# Altium PCB NMEA2K-Converter-v1.0.PcbDoc (part 1 of 4)
Units mil, origin at the board's own origin, x right, y up, seen from the top; angles counter-clockwise.
Board outline 1771.65 x 1968.5 mil, 4 copper layers (Top Layer, Layer 1, Layer 2, Bottom Layer), stack 62.45 mil thick; 138 components, 82 nets, 467 pads, 178 vias.
Unrouted connection lines stored in the file: 6.
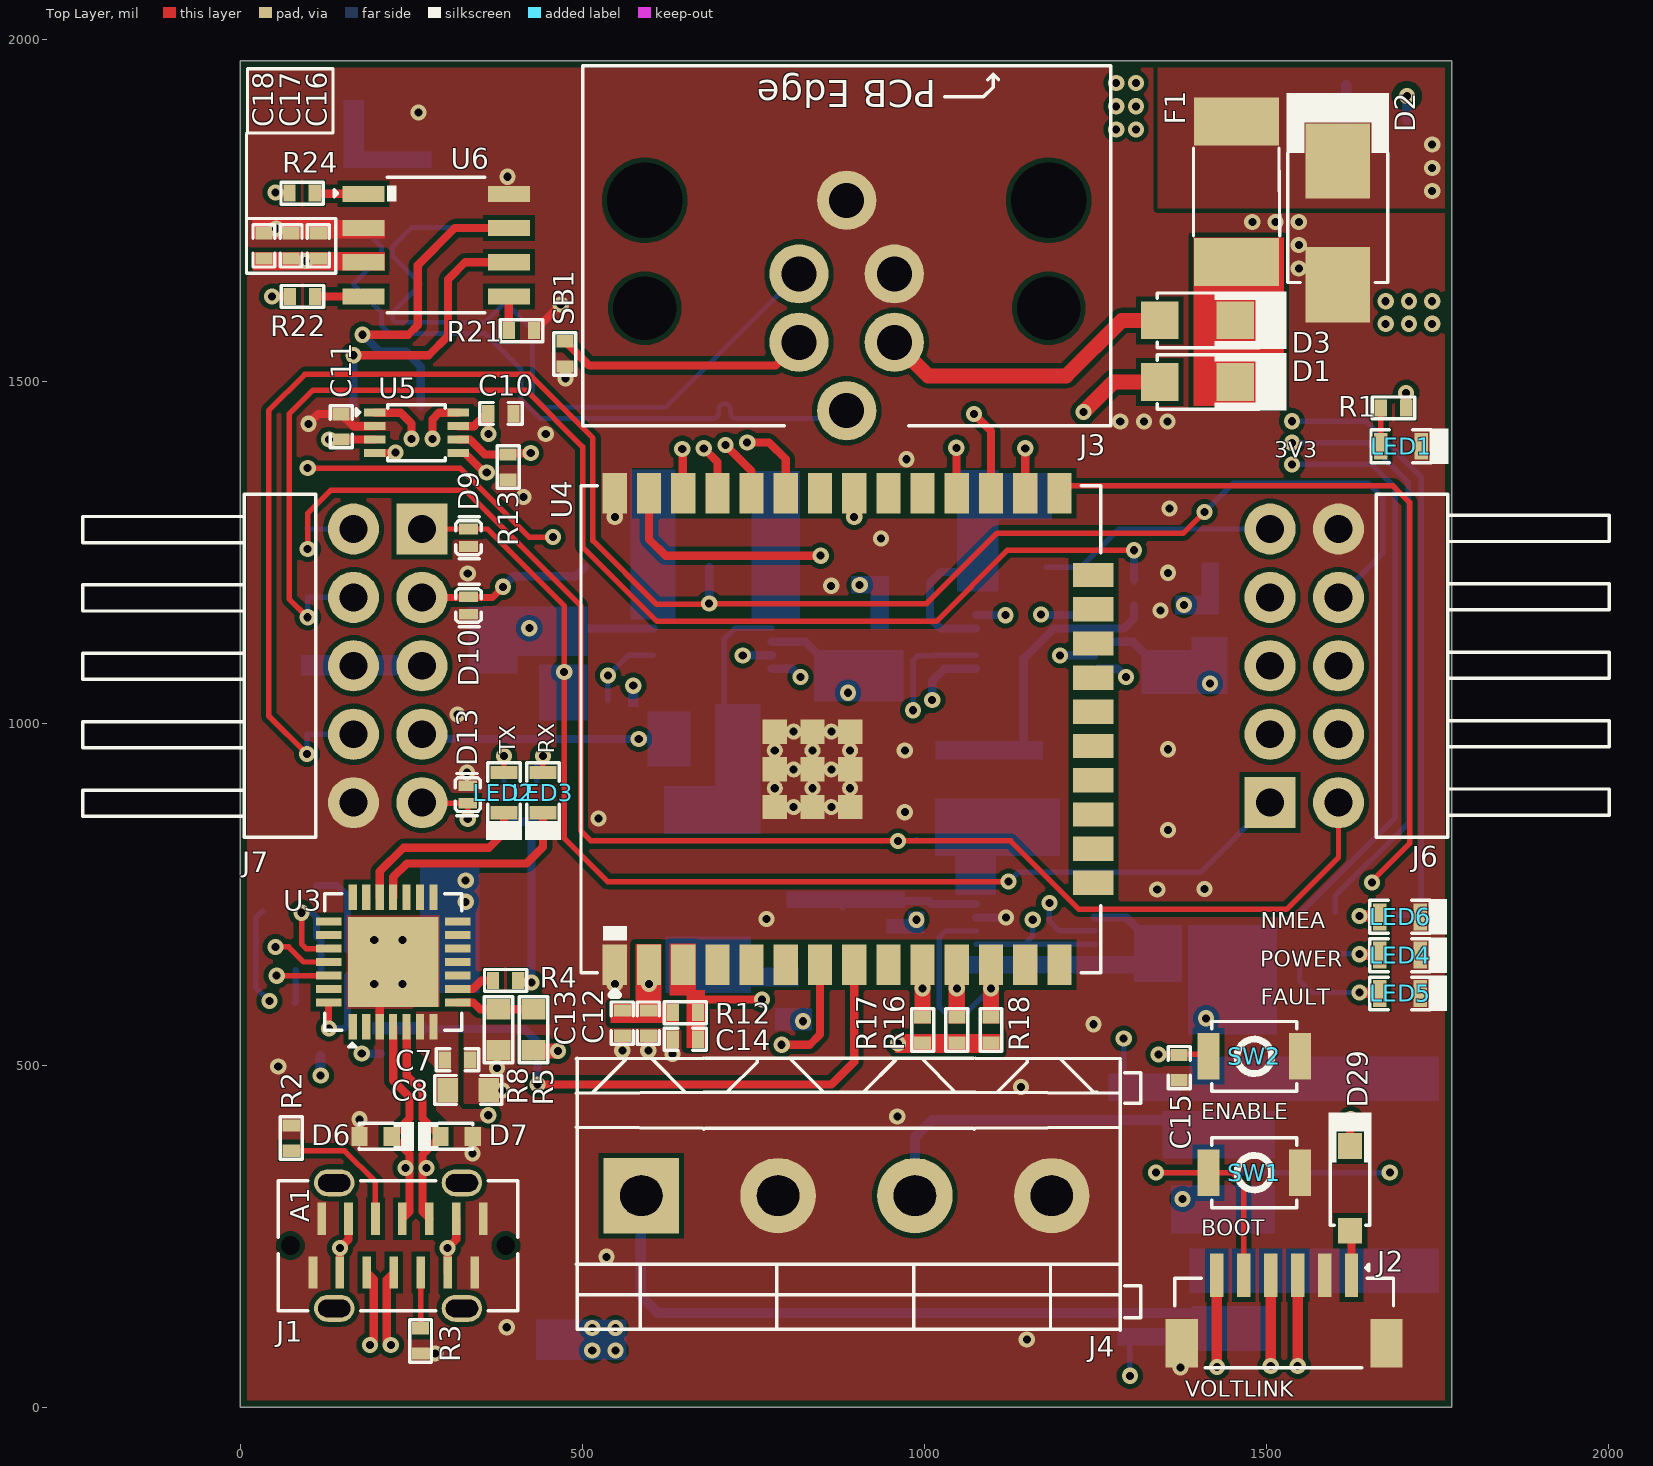
[diagram p0: Top Layer view]
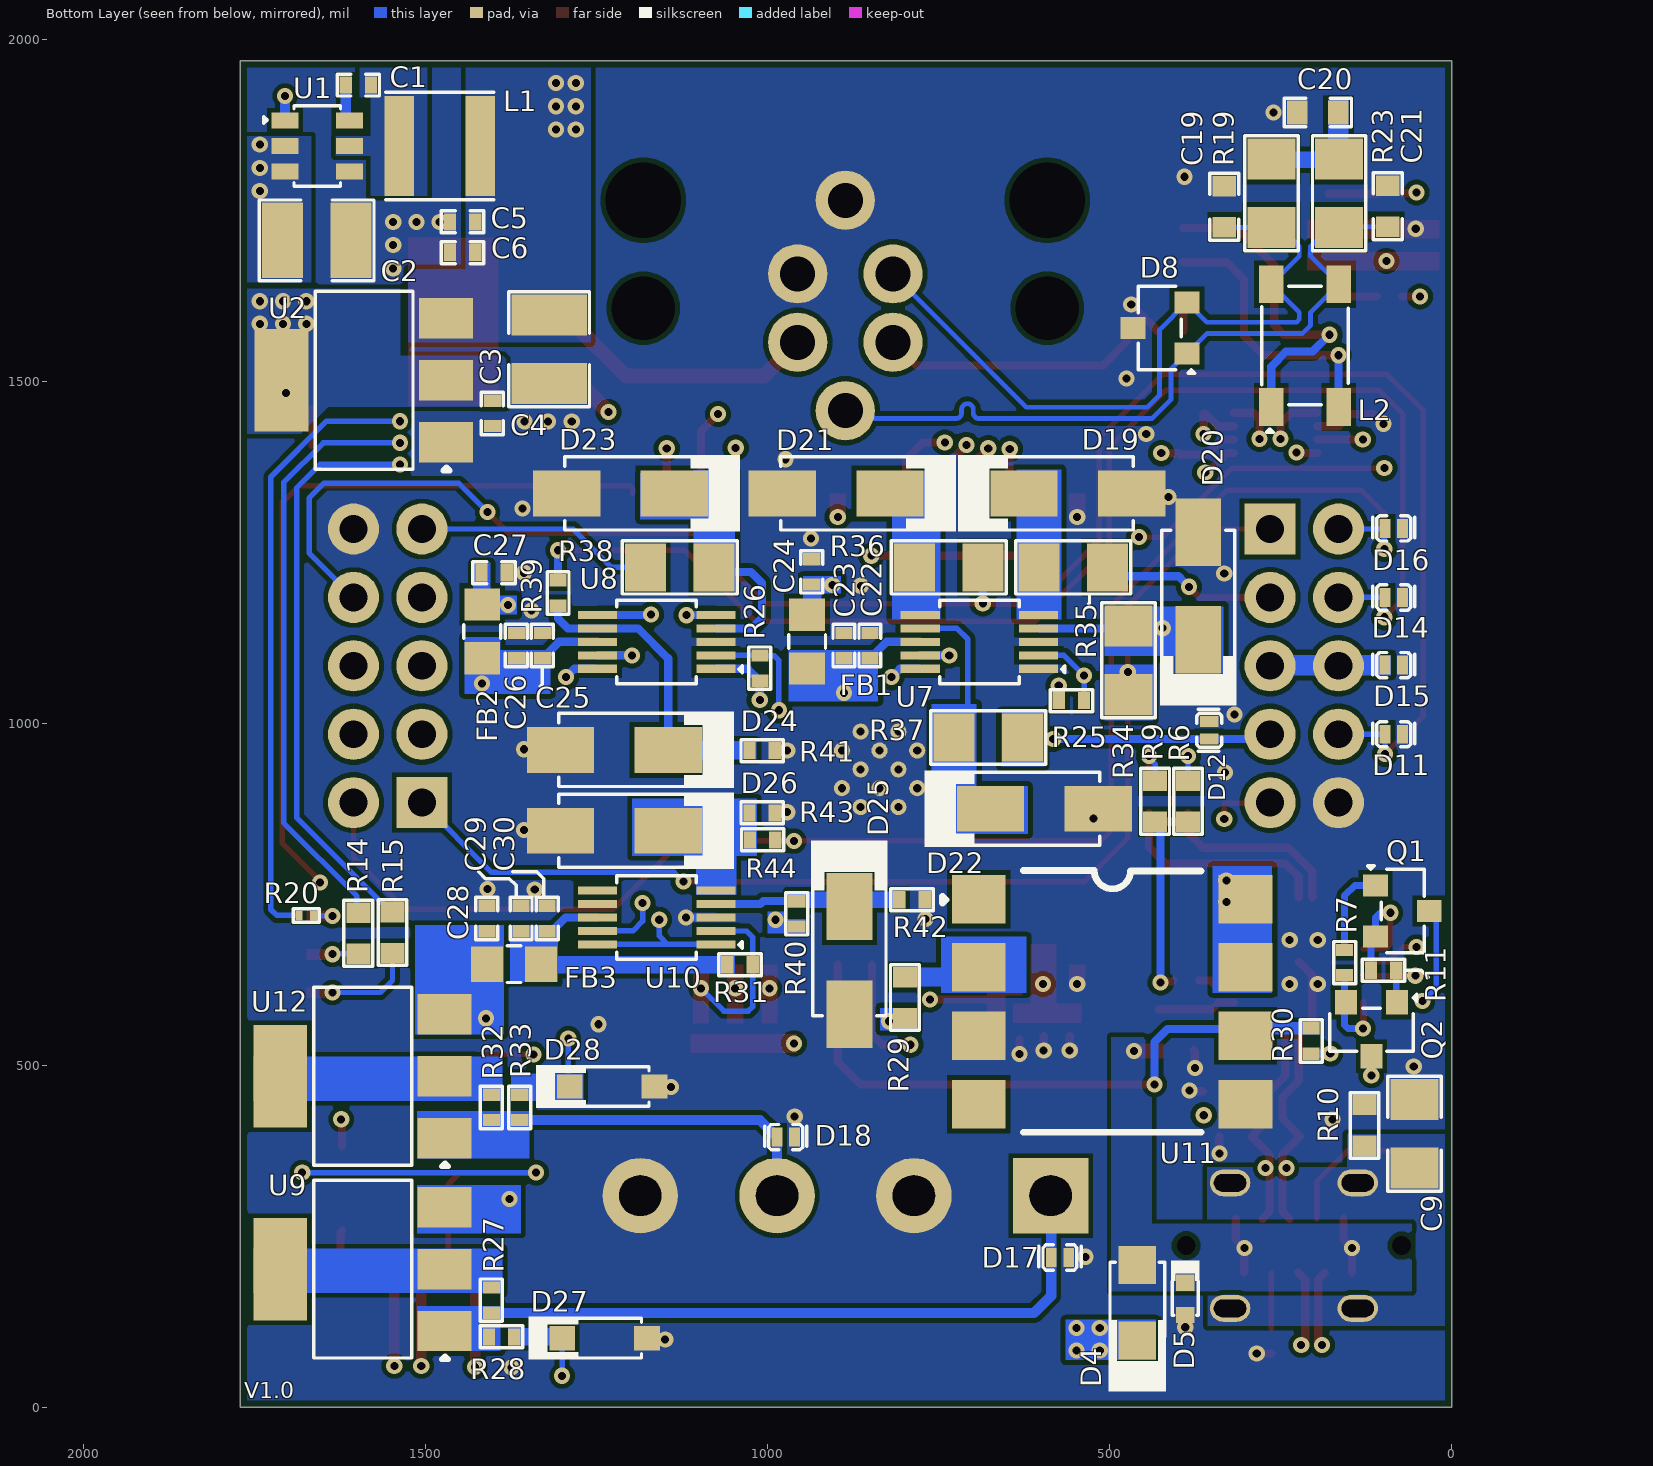
[diagram p1: Bottom Layer view, seen from below]
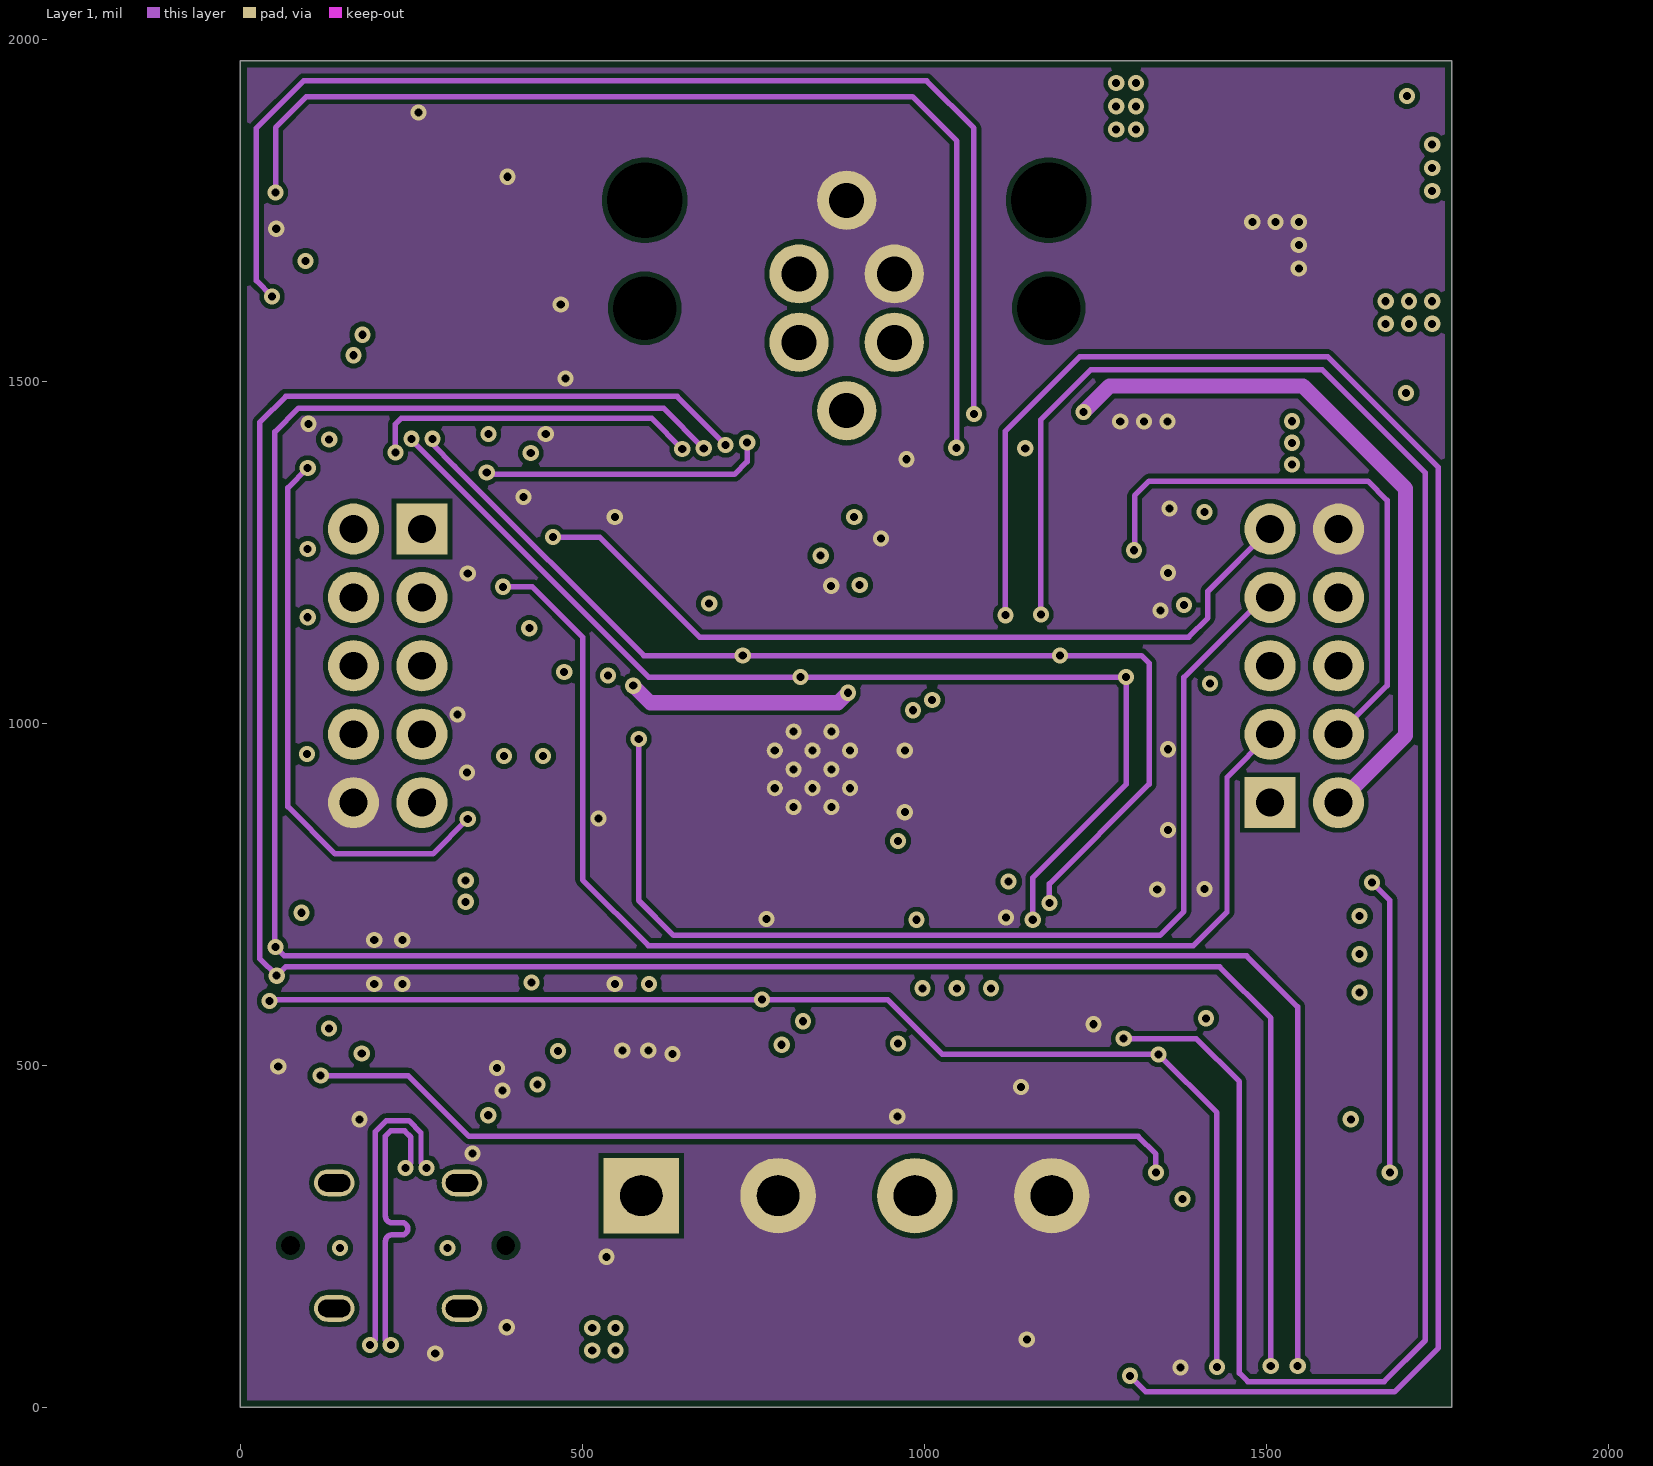
[diagram p2: Layer 1]
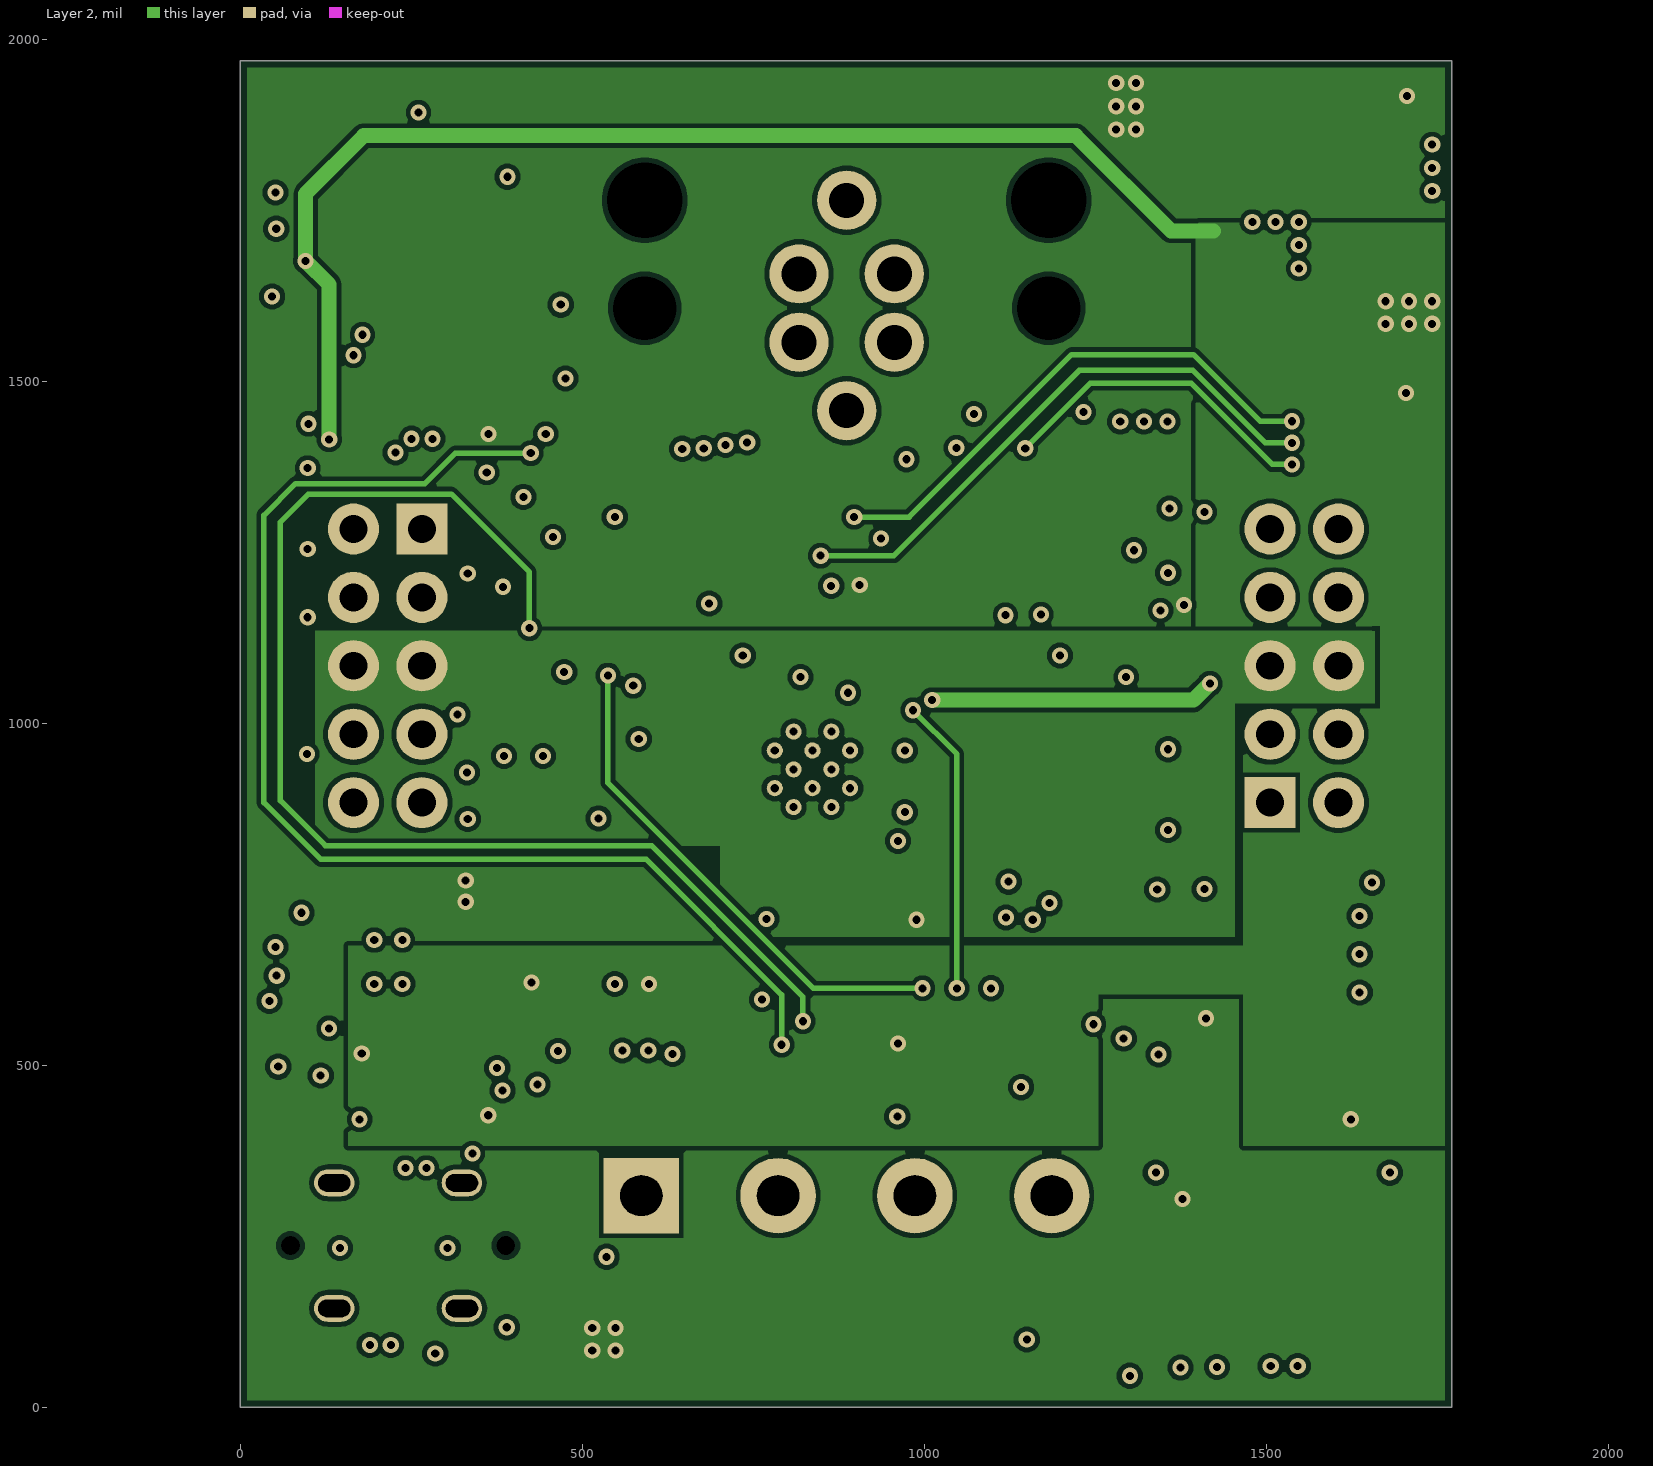
[diagram p3: Layer 2]
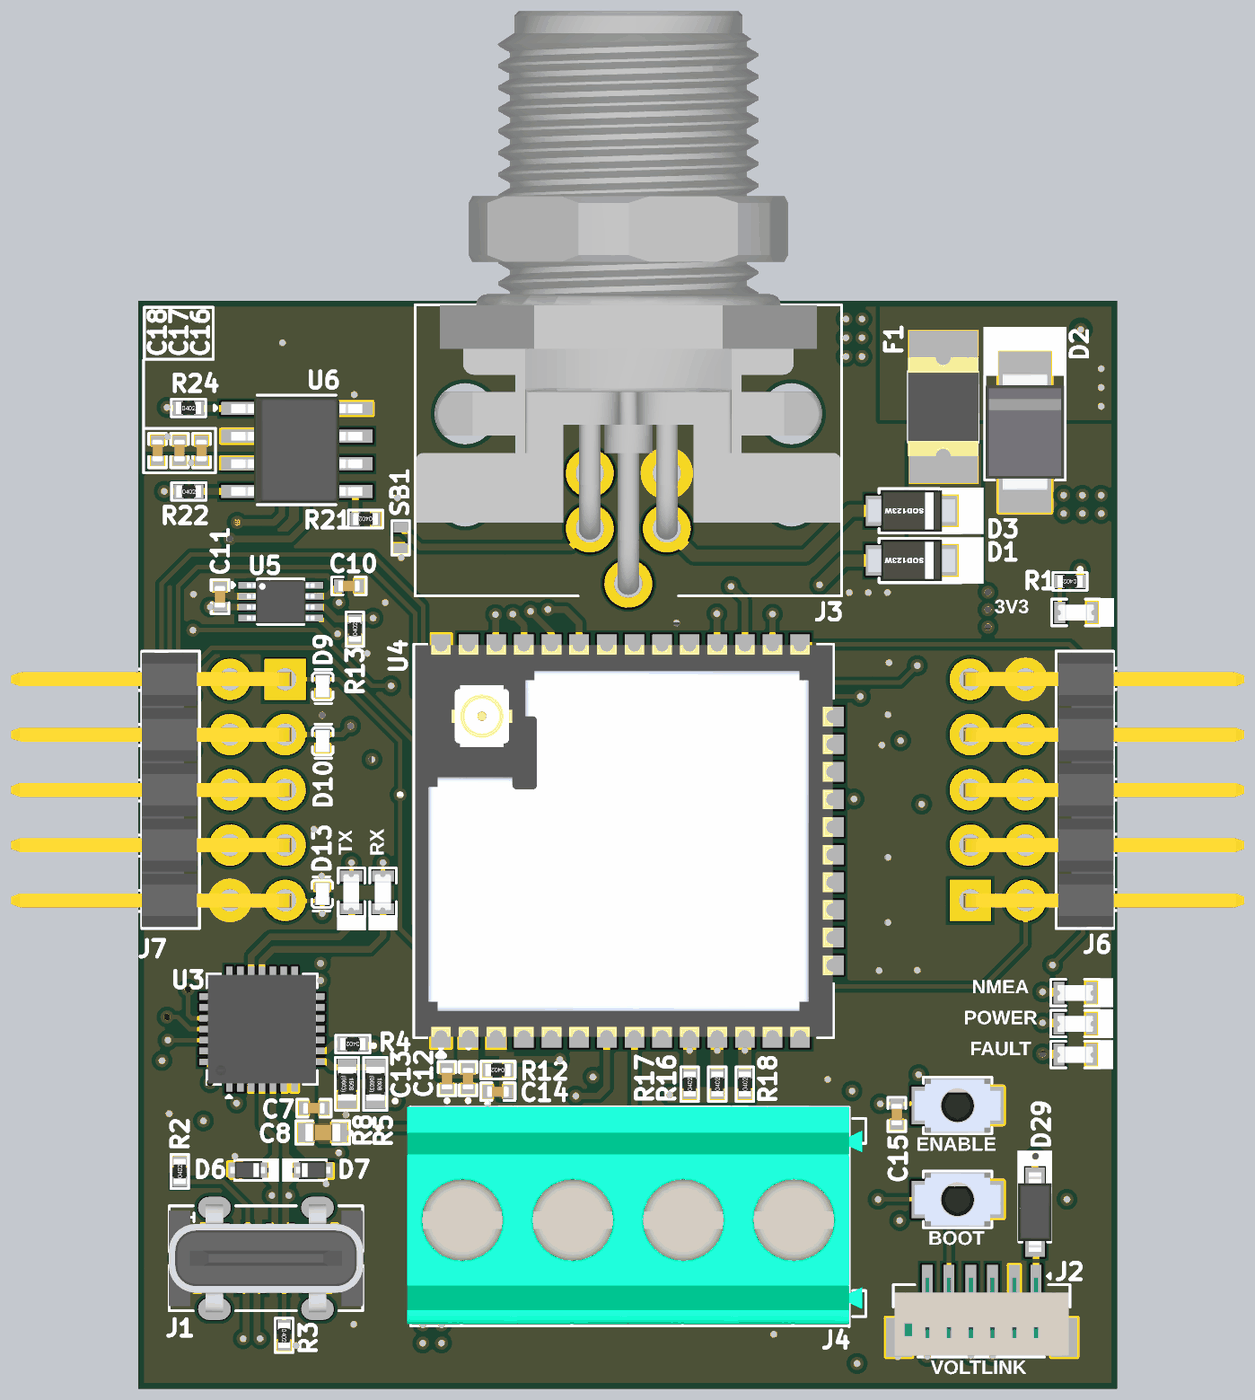
[diagram p5: 3D render of the assembled board from above, using the file's embedded part models]
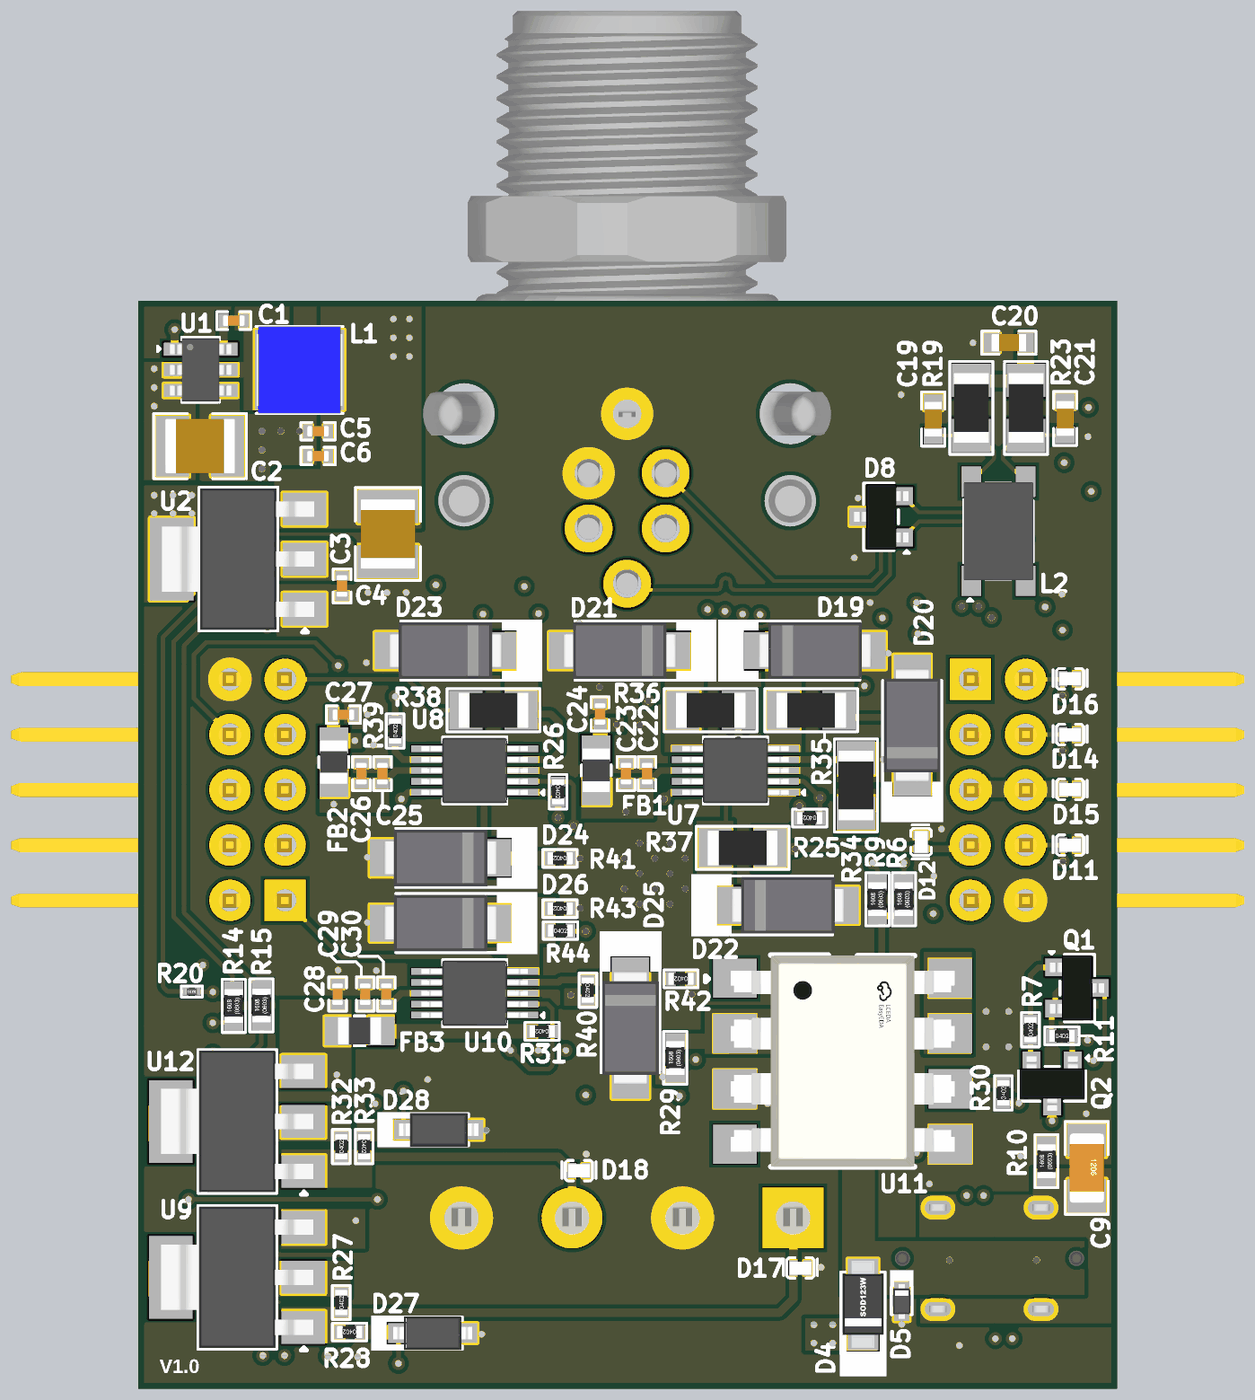
[diagram p6: 3D render of the assembled board from below, using the file's embedded part models]

## Layer stack, top to bottom
Top Solder: solder mask 0.4, Solder Resist, Dk 3.5
Top Layer: signal copper 1.38
Dielectric 2: prepreg 8.28, PP-006, Dk 4.1
Layer 1: signal copper 0.6
Dielectric 1: dielectric 41.93, FR-4, Dk 4.8
Layer 2: signal copper 0.6
Dielectric 3: prepreg 8.28, PP-006, Dk 4.1
Bottom Layer: signal copper 1.38
Bottom Solder: solder mask 0.4, Solder Resist, Dk 3.5

## Board outline
0,0 0,1968.5 1771.65,1968.5 1771.65,0

## Design rules (kind name [scope] priority, off if disabled: settings)
BoardOutlineClearance [All] p1: gap=0 ignorepadtopadclearanceinfootprint=FALSE except(10: Poly-OutlineEdge)
Clearance [All] p1: gap=7 ignorepadtopadclearanceinfootprint=FALSE except(0: Arc-Hole Track-Hole SMDPad-Hole THPad-Hole Via-Hole Fill-Hole Poly-Hole Region-Hole Text-Hole; 4: Arc-SMDPad Track-SMDPad SMDPad-SMDPad)
DiffPairsRouting USB [InDifferentialPairClass('USB_Lines')] p1: maxlimit=7 minlimit=7 mostfreqgap=7 toplayer_minwidth=12 toplayer_maxwidth=12 toplayer_prefwidth=12 midlayer1_minwidth=8 midlayer1_maxwidth=8 midlayer1_prefwidth=8 midlayer2_minwidth=8 midlayer2_maxwidth=8 midlayer2_prefwidth=8 bottomlayer_minwidth=12 bottomlayer_maxwidth=12 bottomlayer_prefwidth=12 impedanceprofiledriven=TRUE impedanceprofileid={A776B313-DDE5-488D-8E31-36333F006AAE} impedanceprofilevalue=90.000000 maxuncoupledlength=500
DiffPairsRouting CAN [InDifferentialPairClass('CAN_Lines')] p2: maxlimit=20 minlimit=9.5 mostfreqgap=20 toplayer_maxgap=9.5 toplayer_prefgap=9.5 toplayer_minwidth=7 toplayer_maxwidth=7 toplayer_prefwidth=7 midlayer1_mingap=20 midlayer1_minwidth=6 midlayer1_maxwidth=6 midlayer1_prefwidth=6 midlayer2_mingap=20 midlayer2_minwidth=6 midlayer2_maxwidth=6 midlayer2_prefwidth=6 bottomlayer_maxgap=9.5 bottomlayer_prefgap=9.5 bottomlayer_minwidth=7 bottomlayer_maxwidth=7 bottomlayer_prefwidth=7 impedanceprofiledriven=TRUE impedanceprofileid={79B5C155-D1C5-4A66-922E-B5FAAE6D1B49} impedanceprofilevalue=120.000000 maxuncoupledlength=500
HoleSize [All] p1: absolutevalues=TRUE maxlimit=1000 minlimit=1 maxpercent=80.000 minpercent=20.000
HoleToHoleClearance [All] p1: gap=2 allowstackedmicrovias=TRUE
MatchedLengths "Schematic Matched Net Lengths" [InNetClass('USB')] p1: tolerance=50 checknetsindiffpair=TRUE checkdiffpairvsdiffpair=FALSE checkxsignals=FALSE checkothers=FALSE
MaxMinImpedance "Schematic Impedance Constraint" [InNetClass('USB')] p1: minimum=85.00 maximum=90.00
MinimumSolderMaskSliver [All] p1: minsoldermaskwidth=0
PlaneConnect [All] p1: planeconnectstyle=Direct reliefexpansion=20 reliefentries=4 reliefconductorwidth=30 reliefairgap=10
PolygonConnect [All] p1: connectstyle=Direct reliefconductorwidth=10 reliefentries=4 polygonreliefangle="90 Angle" airgapwidth=10
RoutingVias [All] p1: holewidth=11.81 width=23.62 viastyle="Through Hole" minholewidth=11.81 minwidth=23.62 maxholewidth=11.81 maxwidth=23.62
SilkToSilkClearance [All] p1: silktosilkclearance=0
SilkToSolderMaskClearance [IsPad] p1: minsilkscreentomaskgap=0 clearancetoexposedcopper=TRUE
SolderMaskExpansion [All] p1: expansion=4 istentingtop=FALSE
UnRoutedNet [All] p1: checkbadconnections=TRUE
Width [All] p1: maxlimit=100 minlimit=6 preferedwidth=12
22 further rules are at their usual default settings.

## Classes and differential pairs
differential pair class USB_Lines: USB_D
differential pair class CAN_Lines: CAN
net class USB: USB_D_N USB_D_P
net class CAN: CAN_N CAN_P
component class U_USB-to-UART-Sheet: C7 C8 C9 D4 D5 D6 D7 J1 LED2 LED3 Q1 Q2 R2 R3 R4 R5 R6 R7 R8 R9 R10 R11 U3
component class U_Sensor-Interface-Sheet: C22 C23 C24 C25 C26 C27 C28 C29 C30 D9 D10 D11 D12 D13 D14 D15 D16 D17 D18 D19 D20 D21 D22 D23 D24 D25 D26 D27 D28 FB1 FB2 FB3 J4 J6 J7 R25 R26 R27 R28 R29 R30 R31 R32 R33 R34 R35 R36 R37 R38 R39 R40 R41 R42 R43 R44 U7 U8 U9 U10 U11 U12
component class U_Power-Sheet-2: C1 C2 C3 C4 C5 C6 D1 D2 D3 F1 L1 LED1 R1 U1 U2
component class U_Controller-Sheet: C10 C11 C12 C13 C14 C15 D29 J2 LED4 LED5 R12 R13 R14 R15 R16 R17 R18 SW1 SW2 U4 U5
component class U_CAN-Transceiver-Sheet: C16 C17 C18 C19 C20 C21 D8 J3 L2 LED6 R19 R20 R21 R22 R23 R24 SB1 U6
differential pair USB_D: +USB_D_P -USB_D_N
differential pair CAN: +CAN_P -CAN_N

## Components (designator, comment, footprint, x,y, rotation, side; value= is the part's Value field where it differs from the comment)
C1 "0.1uF" Cap-0402 1598.87,1932.68 r0 bottom
C2 "10uF" Cap-1210 1659.87,1705.68 r0 bottom
C3 "22uF" Cap-0402 1402.87,1452.68 r90 bottom
C4 "10uF" Cap-1210 1319.87,1546.68 r90 bottom
C5 "22uF" Cap-0402 1446.37,1732.68 r180 bottom
C6 "22uF" Cap-0402 1446.37,1687.68 r180 bottom
C7 "1uF" Cap-0402 317.87,507.68 r0 top
C8 "4.7UF" Cap-0603 333.87,463.68 r180 top
C9 "4.7nF" Cap-1206 54.87,399.68 r270 bottom
C10 "0.1uF" Cap-0402 381.37,1452.68 r180 top
C11 "0.1uF" Cap-0402 147.87,1433.18 r270 top
C12 "22uF" Cap-0402 596.87,561.18 r90 top
C13 "0.1uF" Cap-0402 558.87,561.18 r90 top
C14 "0.1uF" Cap-0402 650.87,537.68 r0 top
C15 "0.1uF" Cap-0402 1372.87,496.18 r90 top
C16 "0.1uF" Cap-0402 114.37,1697.68 r270 top
C17 "1uF" Cap-0402 74.62,1697.68 r90 top
C18 "10uF" Cap-0402 34.87,1697.68 r270 top
C19 "68pF" Cap-0603 332.87,1754.68 r270 bottom
C20 "4.7nF" Cap-0603 195.87,1892.68 r0 bottom
C21 "68pF" Cap-0603 93.87,1755.68 r90 bottom
C22 "0.1uF" Cap-0402 850.87,1113.18 r90 bottom
C23 "1uF" Cap-0402 888.87,1113.18 r90 bottom
C24 "1uF" Cap-0402 935.87,1221.18 r90 bottom
C25 "0.1uF" Cap-0402 1329.75,1113.18 r90 bottom
C26 "1uF" Cap-0402 1367.87,1113.18 r90 bottom
C27 "1uF" Cap-0402 1400.37,1219.68 r180 bottom
C28 "0.1uF" Cap-0402 1322.75,714.18 r90 bottom
C29 "1uF" Cap-0402 1360.87,714.18 r90 bottom
C30 "1uF" Cap-0402 1410.87,714.18 r90 bottom
D1 "PMEG3010ER,115" SOD-123W 1399.76,1498.68 r0 top
D2 "SMBJ26A-13-F" SMB_ 1604.87,1731.13 r90 top
D3 "PMEG3010ER,115" SOD-123W 1399.76,1588.68 r0 top
D4 "PMEG3010ER,115" SOD-123W 459.87,152.56 r270 bottom
D5 "LESD5D5.0CT1G" SOD-523 389.87,158.06 r90 bottom
D6 "LESD5D5.0CT1G" SOD-523 198.25,395.68 r0 top
D7 "LESD5D5.0CT1G" SOD-523 316.5,395.68 r180 top
D8 "CDSOT23-SM712" SOT-23 426.87,1577.68 r90 bottom value=75pF
D9 "PESD12VV1BL,315" "DFN1006-2L (Bi-Directional)" 333.87,1270.88 r90 top value=25pF
D10 "PESD12VV1BL,315" "DFN1006-2L (Bi-Directional)" 333.87,1171.88 r90 top value=25pF
D11 "PESD12VV1BL,315" "DFN1006-2L (Bi-Directional)" 85.08,983.68 r0 bottom value=25pF
D12 "PESD12VV1BL,315" "DFN1006-2L (Bi-Directional)" 354.87,989.47 r270 bottom value=25pF
D13 "PESD12VV1BL,315" "DFN1006-2L (Bi-Directional)" 332.87,895.47 r270 top value=25pF
D14 "PESD12VV1BL,315" "DFN1006-2L (Bi-Directional)" 85.08,1183.68 r0 bottom value=25pF
D15 "PESD12VV1BL,315" "DFN1006-2L (Bi-Directional)" 85.08,1084.68 r0 bottom value=25pF
D16 "PESD12VV1BL,315" "DFN1006-2L (Bi-Directional)" 85.08,1284.68 r0 bottom value=25pF
D17 "PESD12VV1BL,315" "DFN1006-2L (Bi-Directional)" 573.08,218.68 r0 bottom value=25pF
D18 "PESD12VV1BL,315" "DFN1006-2L (Bi-Directional)" 974.08,394.68 r0 bottom value=25pF
D19 "1SMA4733A" SMA 370.87,1200.42 r90 bottom
D20 "1SMA4733A" SMA 546.87,1335.68 r180 bottom
D21 "1SMA4733A" SMA 900.27,1335.68 r0 bottom
D22 "1SMA4733A" SMA 595.87,874.68 r180 bottom
D23 "1SMA4733A" SMA 1215.61,1335.68 r0 bottom
D24 "1SMA4733A" SMA 1224.61,960.68 r0 bottom
D25 "1SMA4733A" SMA 880.87,652.94 r270 bottom
D26 "1SMA4733A" SMA 1224.61,842.68 r0 bottom
D27 "MMSZ5231B-7-F" SOD-123 1238.87,100.68 r0 bottom
D28 "MMSZ5231B-7-F" SOD-123 1227.87,468.68 r0 bottom
D29 "MBR120VLSFT3G" SOD-123 1622.87,319.68 r90 top
F1 "1812L075/48GR" 1812-FUSE 1456.87,1776.68 r270 top
FB1 "MMZ2012R102ATD25" Ind-0805 942.87,1119.05 r90 bottom
FB2 "MMZ2012R102ATD25" Ind-0805 1417.87,1134.05 r90 bottom
FB3 "MMZ2012R102ATD25" Ind-0805 1371.24,647.68 r0 bottom
J1 "TYPE-C-31-D-07" TYPE-C-31-D-07 231.06,236.05 r90 top
J2 "Voltlink Target" "Voltlink Target" 1526.45,142.97 r180 top
J3 "T4144035051-000" T4144035051-000 886.87,1610.42 r180 top locked
J4 "DB128L-5.08-4P-GN-S" DB128L-5.08-4P-GN-S 886.61,309.06 r0 top
J6 "2541WR-2x05P" "HDR 2x5TH (rigth angle)" 1555.87,1083.68 r90 top
J7 "2541WR-2x05P" "HDR 2x5TH (rigth angle)" 215.87,1083.68 r270 top
L1 "4.7uH" SWPA4030S4R7MT_ 1479.82,1843.68 r180 bottom
L2 "ACT45B-510-2P-TL003" ACT45B-510-2P-TL003 214.87,1551.68 r90 bottom value=51uH
LED1 "RED" LED-0603 1697.35,1404.68 r0 top
LED2 "Yellow" LED-0603 385.87,898.2 r270 top
LED3 "Yellow" LED-0603 442.87,898.2 r270 top
LED4 "Emerald" LED-0603 1695.82,660.68 r0 top
LED5 "RED" LED-0603 1695.82,604.68 r0 top
LED6 "Blue" LED-0603 1695.82,716.68 r0 top
Q1 "SS8050-G" SOT-23 72.5,725.08 r270 bottom
Q2 "SS8050-G" SOT-23 117.47,552.31 r0 bottom
R1 "240R" Res-0402 1686.32,1460.73 r180 top
R2 "5.1K" Res-0402 74.87,393.18 r90 top
R3 "5.1K" Res-0402 263.87,96.68 r270 top
R4 "2K" Res-0402 388.37,623.68 r180 top value=2kR
R5 "22.1K" Res-0603 428.87,551.68 r90 top
R6 "220R" Res-0603 385.87,885.68 r270 bottom
R7 "10K" Res-0402 156.87,649.68 r90 bottom
R8 "47.5K" Res-0603 377.87,551.68 r90 top
R9 "220R" Res-0603 433.87,885.68 r270 bottom
R10 "1M" Res-0603 127.87,411.68 r270 bottom
R11 "10K" Res-0402 99.87,638.68 r180 bottom
R12 "10K" Res-0402 650.87,576.68 r180 top
R13 "4.7K" Res-0402 391.87,1374.18 r90 top
R14 "240R" Res-0603 1598.87,692.68 r270 bottom
R15 "240R" Res-0603 1548.87,693.68 r270 bottom
R16 "4.7K" Res-0402 997.87,551.18 r90 top
R17 "4.7K" Res-0402 1047.87,551.18 r90 top
R18 "4.7K" Res-0402 1097.87,551.18 r90 top
R19 "59R" Res-1206 263.87,1774.68 r270 bottom
R20 "220R" Res-0201 1674.7,718.68 r0 bottom
R21 "3.3K" Res-0402 411.37,1573.68 r180 top
R22 "0R" Res-0402 91.37,1623.68 r0 top
R23 "59R" Res-1206 164.87,1774.68 r90 bottom
R24 "0R" Res-0402 90.87,1774.68 r0 top
R25 "10K" Res-0402 556.37,1032.68 r0 bottom
R26 "10K" Res-0402 1011.87,1080.18 r270 bottom
R27 "120R" Res-0402 1404.37,156.18 r90 bottom
R28 "100R" Res-0402 1389.37,102.68 r0 bottom
R29 "470R" Res-0603 799.87,598.68 r270 bottom
R30 "3.3K" Res-0402 205.87,535.18 r90 bottom
R31 "10K" Res-0402 1040.87,646.68 r0 bottom
R32 "120R" Res-0402 1404.37,438.18 r90 bottom
R33 "100R" Res-0402 1362.87,438.18 r270 bottom
R34 "100R" Res-1206 472.87,1091.68 r270 bottom
R35 "100R" Res-1206 553.87,1227.68 r180 bottom
R36 "100R" Res-1206 735.87,1227.68 r180 bottom
R37 "100R" Res-1206 677.87,978.68 r180 bottom
R38 "100R" Res-1206 1128.87,1227.68 r0 bottom
R39 "100K" Res-0402 1306.87,1190.18 r90 bottom
R40 "100K" Res-0402 957.87,721.18 r270 bottom
R41 "39K" Res-0402 1008.37,959.68 r0 bottom
R42 "39K" Res-0402 789.37,741.68 r0 bottom
R43 "39K" Res-0402 1008.37,868.68 r0 bottom
R44 "100K" Res-0402 1007.67,829.2 r180 bottom
SB1 "Solder Bridge 0402" "Solder Bridge 0402" 474.87,1539.68 r90 top
SW1 "B3U-1000P" B3U-1000P 1482.87,342.68 r0 top
SW2 "B3U-1000P" B3U-1000P 1482.87,512.68 r0 top
U1 "AP63205WU-7" TSOT-23-6 1658.87,1843.68 r180 bottom
U2 "AMS1117-3.3" "SOT- 223" 1590.95,1501.13 r90 bottom
U3 "CP2102N-A02-GQFN28R" "28-QFN (5x5)_" 223.87,650.68 r90 top
U4 "ESP32-WROOM-32UE-N16" ESP32-WROOM-32UE-N16 897.48,991.19 r90 top
U5 "TXS0102DCUR" VSSOP-8(3.1x2.1) 257.85,1424.2 r0 top
U6 "TCAN3414DR" "SOIC-8(0.154\", 3.90mm Width)" 286.87,1698.68 r0 top
U7 "ADS1115IDGSR" VSSOP-10 690.73,1118.71 r0 bottom
U8 "ADS1115IDGSR" VSSOP-10 1162.73,1118.71 r0 bottom
U9 "LM317MDCYR" "SOT- 223" 1592.94,201.68 r90 bottom
U10 "ADS1115IDGSR" VSSOP-10 1162.73,715.68 r0 bottom
U11 "6N137S" "SOP-8 (S Type)" 496.87,592.68 r180 bottom
U12 "LM317MDCYR" "SOT- 223" 1592.94,483.68 r90 bottom

## Footprints (in the part's own frame and the unit in brackets; to place one, negate y for a bottom-side part, rotate by r counter-clockwise, add the part's x,y. Pads: shape width x height; smd on the part's side, far side on the other; paste and mask are expansions set on the pad)
"28-QFN (5x5)_" [mm]
  rect 0.95x0.3 smd: 1(-2.4,1.5) 2(-2.4,1) 3(-2.4,0.5) 4(-2.4,0) 5(-2.4,-0.5) 6(-2.4,-1) 7(-2.4,-1.5) 15(2.4,-1.5) 16(2.4,-1) 17(2.4,-0.5) 18(2.4,0) 19(2.4,0.5) 20(2.4,1) 21(2.4,1.5)
  rect 0.3x0.95 smd: 8(-1.5,-2.4) 9(-1,-2.4) 10(-0.5,-2.4) 11(0,-2.4) 12(0.5,-2.4) 13(1,-2.4) 14(1.5,-2.4) 22(1.5,2.4) 23(1,2.4) 24(0.5,2.4) 25(0,2.4) 26(-0.5,2.4) 27(-1,2.4) 28(-1.5,2.4)
  rect 3.35x3.35 smd: 29(0,0)
  silkscreen extent -3.15,-2.54 2.54,2.54, body extent -2.5,-2.5 2.5,2.5, height 1
1812-FUSE [mm] "13.2V 2.6A 40A 800mW -40?~+85? 5.2A 10mO 2.5s 50mO 1812 Resettable Fuses ROHS"
  rect 1.78x3.15 smd mask+0.05: 1(-2.615,0) 2(2.615,0)
  silkscreen extent -1.63,-1.6 1.63,1.6, body extent -2.27,-1.62 2.27,1.62, height 0.85
ACT45B-510-2P-TL003 [mm]
  rect 1.4x0.9 smd paste+0 mask+0.051: 1(-2.28,1.25) 2(-2.28,-1.25) 3(2.28,-1.25) 4(2.28,1.25)
  silkscreen extent -3.22,-1.6 2.2,1.6, body extent -2.25,-1.6 2.25,1.6, height 3
B3U-1000P [mm] "SWITCH TACTILE SPST-NO 0.05A 12V"
  rect 0.82x1.72 smd: 1(-1.7,0) 2(1.7,0)
  silkscreen extent -1.57,-1.3 1.57,1.3, body extent -2,-1.26 2,1.24, height 1.6
Cap-0402 [mil]
  rect 18x25 smd mask+2.36: 1(-18.5,0) 2(18.5,0)
  silkscreen extent -31,-16 31,16, body extent -20,-10 20,10, height 19
Cap-0603 [mil]
  rect 30x35 smd mask+2.36: 1(-30,0) 2(30,0)
  silkscreen extent -49,-21 49,21, body extent -32,-16 31,16, height 34
Cap-1206 [mil] "SMD 1206"
  rect 60x70 smd: 1(-50,0) 2(50,0)
  silkscreen extent -84,-39 84,39, body extent -63,-31 63,32, height 39
Cap-1210 [mil] "SMD 1210"
  rect 60x110 smd: 1(-50,0) 2(50,0)
  silkscreen extent -84,-59 84,59, body extent -63,-49 63,49, height 39
DB128L-5.08-4P-GN-S [mm]
  rect 2.8x2.8 hole 1.5 slot 1.575 at 0 deg paste+0 mask+0.05: 1(-7.62,0)
  round 2.8 hole 1.5 slot 1.575 at 0 deg paste+0 mask+0.05: 2(-2.54,0) 3(2.54,0) 4(7.62,0)
  silkscreen extent -10.03,-5 10.92,5.1, body extent -10.16,-4.88 10.76,5.12, height 14
"DFN1006-2L (Bi-Directional)" [mm]
  rect 0.4x0.7 smd paste+0 mask+0.051: 1(-0.325,0) 2(0.325,0)
  silkscreen extent -0.78,-0.47 0.78,0.47, body extent -0.5,-0.3 0.5,0.3, height 0.47
ESP32-WROOM-32UE-N16 [mm]
  rect 1.5x0.9 smd: 1(-8.75,8.88) 2(-8.75,7.61) 3(-8.75,6.34) 4(-8.75,5.07) 5(-8.75,3.8) 6(-8.75,2.53) 7(-8.75,1.26) 8(-8.75,-0.01) 9(-8.75,-1.28) 10(-8.75,-2.55) 11(-8.75,-3.82) 12(-8.75,-5.09) 13(-8.75,-6.36) 14(-8.75,-7.63) 25(8.75,-7.63) 26(8.75,-6.36) 27(8.75,-5.09) 28(8.75,-3.82) 29(8.75,-2.55) 30(8.75,-1.28) 31(8.75,-0.01) 32(8.75,1.26) 33(8.75,2.53) 34(8.75,3.8) 35(8.75,5.07) 36(8.75,6.34) 37(8.75,7.61) 38(8.75,8.88)
  rect 0.9x1.5 smd: 15(-5.71,-8.88) 16(-4.44,-8.88) 17(-3.17,-8.88) 18(-1.9,-8.88) 19(-0.63,-8.88) 20(0.64,-8.88) 21(1.91,-8.88) 22(3.18,-8.88) 23(4.45,-8.88) 24(5.72,-8.88)
  rect 0.9x0.9 smd: 39(-2.896,0.14) 39(-2.896,1.54) 39(-2.896,2.94) 39(-1.496,1.54) 39(-1.496,2.94) 39(-1.496,0.14) 39(-0.096,2.94) 39(-0.096,1.54) 39(-0.096,0.14)
  round 0.6 hole 0.3 mask+0: 39(-2.896,0.84) 39(-2.896,2.24) 39(-2.196,0.14) 39(-2.196,1.54) 39(-2.196,2.94) 39(-1.496,2.24) 39(-1.496,0.84) 39(-0.796,2.94) 39(-0.796,1.54) 39(-0.796,0.14) 39(-0.096,2.24) 39(-0.096,0.84)
  silkscreen extent -9.87,-9.17 9.04,10.13, body extent -9,-9.13 9,10.07, height 3.35
"HDR 2x5TH (rigth angle)" [mm]
  rect 1.9x1.9 hole 1.03 paste+0 mask+0.051: 1(-5.08,1.27)
  round 1.9 hole 1.03 paste+0 mask+0.051: 2(-5.08,-1.27) 3(-2.54,1.27) 4(-2.54,-1.27) 5(0,1.27) 6(0,-1.27) 7(2.54,1.27) 8(2.54,-1.27) 9(5.08,1.27) 10(5.08,-1.27)
  silkscreen extent -6.37,-11.33 6.37,-2.67, body extent -6.31,-11.33 6.3,1.57, height 5
Ind-0805 [mm] "Inductor 0805"
  rect 1.2x1.32 smd: 1(-1,0) 2(1,0)
  silkscreen extent -0.25,-0.69 0.25,0.69, body extent -1,-0.62 1,0.63, height 0.47
LED-0603 [mm]
  rect 0.5x1 smd: 1(-0.75,0) 2(0.75,0)
  silkscreen extent -1.12,-0.66 1.75,0.66, body extent -0.82,-0.37 0.82,0.36, height 0.68
Res-0201 [mm]
  rect 0.27x0.37 smd mask+0.055: 1(-0.275,0) 2(0.275,0)
  silkscreen extent -0.48,-0.25 0.48,0.25, body extent -0.3,-0.15 0.3,0.15, height 0.29
Res-0402 [mil]
  rect 18x25 smd mask+2.17: 1(-18.5,0) 2(18.5,0)
  silkscreen extent -32,-17 32,16, body extent -23,-11 23,11, height 16
Res-0603 [mil]
  rect 30x35 smd: 1(-30,0) 2(30,0)
  silkscreen extent -48,-21 48,21, body extent -31,-17 31,17, height 18
Res-1206 [mil]
  rect 60x70 smd: 1(-50,0) 2(50,0)
  silkscreen extent -84,-39 84,39, body extent -63,-31 63,31, height 24
SMA [mm]
  rect 2.5x1.7 smd: 1(-2,0) 2(2,0)
  silkscreen extent -4.44,-1.42 2.06,1.42, body extent -2.6,-1.3 2.6,1.3, height 2.4
SMB_ [mm]
  rect 2.8x2.4 smd: 1(-2.3,0) 2(2.3,0)
  silkscreen extent -2.21,-1.91 4.83,1.91, body extent -2.7,-1.8 2.7,1.8, height 2.3
SOD-123 [mm]
  rect 0.95x0.9 smd: 1(-1.575,0) 2(1.575,0)
  silkscreen extent -1.37,-0.8 2.82,0.8, body extent -1.82,-0.77 1.83,0.78, height 1.5
SOD-123W [mm] "DIODE SCHOTTKY 30V 1A SOD123W"
  rect 1.4x1.4 smd: 1(-1.4,0) 2(1.4,0)
  silkscreen extent -1.5,-1.07 3.3,1.07, body extent -2,-0.95 2,0.95, height 1.1
SOD-523 [mm] "SOD-523 Schottky Barrier Diodes (SBD) ROHS"
  rect 0.6x0.7 smd: 1(-0.6,0) 2(0.6,0)
  silkscreen extent -0.61,-0.53 1.42,0.53, body extent -0.8,-0.4 0.8,0.4, height 0.7
"SOIC-8(0.154\", 3.90mm Width)" [mm]
  rect 1.55x0.6 smd: 1(-2.7,1.905) 2(-2.7,0.635) 3(-2.7,-0.635) 4(-2.7,-1.905) 5(2.7,-1.905) 6(2.7,-0.635) 7(2.7,0.635) 8(2.7,1.905)
  silkscreen extent -3.79,-2.51 1.8,2.51, body extent -3.01,-2.45 3.01,2.45, height 1.63
"Solder Bridge 0402" [mil]
  rect 18x25 smd mask+2.17: 1(-18.5,0) 2(18.5,0)
  silkscreen extent -32,-17 32,16
"SOP-8 (S Type)" [mm]
  rect 2x1.8 smd paste+0 mask+0.051: 1(-4.95,3.81) 2(-4.95,1.27) 3(-4.95,-1.27) 4(-4.95,-3.81) 5(4.95,-3.81) 6(4.95,-1.27) 7(4.95,1.27) 8(4.95,3.81)
  silkscreen extent -6.3,-4.85 3.3,4.88, body extent -5.15,-4.85 5.15,4.85, height 5.08
SOT-23 [mm] "TRANS NPN 40V 0.6A SOT23"
  rect 0.82x0.92 smd: 1(-0.95,-1) 2(0.95,-1) 3(0,1)
  silkscreen extent -1.68,-1.3 1.55,0.81, body extent -1.5,-1.25 1.5,1.25, height 1.05
"SOT- 223" [mm]
  rect 1.5x2 smd: 1(-2.3,-3.05) 2(0,-3.05) 3(2.3,-3.05)
  rect 3.8x2 smd: 4(0,3.05)
  silkscreen extent -3.35,-3.2 3.3,1.8, body extent -3.25,-3.5 3.25,3.5, height 1.61
SWPA4030S4R7MT_ [mm]
  rect 1.1x3.7 smd: 1(-1.5,0) 2(1.5,0)
  silkscreen extent -2,-2 2,2, body extent -2,-2 2,2, height 3
T4144035051-000 [mm]
  round 2.2 hole 1.3: 1(1.77,1.365) 2(-1.77,1.365) 3(-1.77,-1.175) 4(1.77,-1.175) 5(0,3.905) SH(0,-3.905)
  round 0 hole 2.81 unplated: MH(-7.5,-3.905) MH(7.5,-3.905)
  round 0 hole 2.36 unplated: MH(-7.5,0.095) MH(7.5,0.095)
  silkscreen extent -9.8,-8.9 9.8,4.47, body extent -9.75,-22.4 9.75,4.41, height 16.5
TSOT-23-6 [mm]
  rect 1x0.6 smd: 1(-1.2,0.95) 2(-1.2,0) 3(-1.2,-0.95) 4(1.2,-0.95) 5(1.2,0) 6(1.2,0.95)
  silkscreen extent -1.98,-1.5 0.86,1.5, body extent -1.41,-1.45 1.41,1.45, height 1
TYPE-C-31-D-07 [mm]
  rect 1.2x0.32 smd paste-100 mask+0.05: A1(1,2.84) A4(1,1.84) A5(1,0.84) A6(1,-0.16) A7(1,-1.16) A9(1,-2.16) A12(1,-3.16) B1(-1,-2.84) B4(-1,-1.84) B5(-1,-0.84) B6(-1,0.16) B7(-1,1.16) B9(-1,2.16) B12(-1,3.16)
  oval 1x1.5 hole 0.65 slot 1.2 at 90 deg paste-2539.97 mask+0.05: S1(2.33,2.37) S2(2.33,-2.37) S3(-2.33,-2.37) S4(-2.33,2.37)
  round 0 hole 0.7 unplated paste-2539.97: ""(0,4) ""(0,-4)
  silkscreen extent -2.41,-4.45 2.41,4.44, body extent -2.48,-4.47 2.48,4.47, height 10
"Voltlink Target" [mm]
  rect 0.5x1.6 smd: 1(-2.5,-1.262) 2(-1.5,-1.262) 3(-0.5,-1.262) 4(0.5,-1.262) 5(1.5,-1.262) 6(2.5,-1.262)
  rect 1.2x1.8 smd: MP1(-3.8,1.262) MP2(3.8,1.262)
  silkscreen extent -4.06,-1.68 4.06,2.17, body extent -4,-1.49 4,2.11, height 4.25
VSSOP-8(3.1x2.1) [mm]
  rect 0.8x0.3 smd mask+0.05: 1(-1.55,0.75) 2(-1.55,0.25) 3(-1.55,-0.25) 4(-1.55,-0.75) 5(1.55,-0.75) 6(1.55,-0.25) 7(1.55,0.25) 8(1.55,0.75)
  silkscreen extent -2.24,-1.04 1.07,1.04, body extent -1.55,-1 1.55,1, height 0.88
VSSOP-10 [mm]
  rect 1.45x0.3 smd paste+0 mask+0.05: 1(-2.2,1) 2(-2.2,0.5) 3(-2.2,0) 4(-2.2,-0.5) 5(-2.2,-1) 6(2.2,-1) 7(2.2,-0.5) 8(2.2,0) 9(2.2,0.5) 10(2.2,1)
  silkscreen extent -3.17,-1.55 1.47,1.55, body extent -2.45,-1.5 2.45,1.5, height 1.07

## Part data
C1 C10 C11 C13 C14 C15 C16 C22 C25 C28: library part CL05B104KB54PNC, "CAP CER 0.1UF 50V X7R 0402", LCSC Part Number=C307331, Manufacturer=Samsung, Supplier Part Number 1=1276-CL05B104KB54PNCDKR-ND, Manufacturer Part Number=CL05B104KB54PNC, Pricing 1="1=0.1, 10=0.067, 50=0.0366, 100=0.0299, 500=0.02138, 1000=0.01681, 2500=0.01528, 5000=0.01406 (USD)", Stock 1=8594, Supplier 1=Digi-Key
C2 C4: library part GRM32ER71J106KA12L, "Multilayer Ceramic Capacitors MLCC - SMD/SMT 1210 10uF 63volts *Derate Voltage/Temp", LCSC Part Number=C437568, Manufacturer=Murata, Package=1210, Category="Ceramic Capacitors", ComponentLink1Description=http://www.mouser.com/ds/2/281/c02e-2905.pdf?src-supplier=Mouser, ComponentLink1URL=http://www.mouser.com/ds/2/281/c02e-2905.pdf?src-supplier=Mouser, ComponentLink2Description=http://www.farnell.com/datasheets/2079202.pdf?src-supplier=Farnell, ComponentLink2URL=http://www.farnell.com/datasheets/2079202.pdf?src-supplier=Farnell, ComponentLink3Description=http://search.murata.co.jp/Ceramy/image/img/A01X/G101/ENG/GRM32ER71J106KA12-01.pdf?src-supplier=Digi-Key, ComponentLink3URL=http://search.murata.co.jp/Ceramy/image/img/A01X/G101/ENG/GRM32ER71J106KA12-01.pdf?src-supplier=Digi-Key, ComponentLink4Description=https://datasheet.octopart.com/GRM32ER71J106KA12L-Murata-datasheet-22122223.pdf?src-supplier=Future+Electronics, ComponentLink4URL=https://datasheet.octopart.com/GRM32ER71J106KA12L-Murata-datasheet-22122223.pdf?src-supplier=Future+Electronics, ComponentLink5Description=http://psearch.en.murata.com/capacitor/product/GRM32ER71J106KA12%23.pdf?src-supplier=Avnet, ComponentLink5URL=http://psearch.en.murata.com/capacitor/product/GRM32ER71J106KA12%23.pdf?src-supplier=Avnet, ComponentLink6Description=http://www.farnell.com/datasheets/2079202.pdf?src-supplier=Newark, ComponentLink6URL=http://www.farnell.com/datasheets/2079202.pdf?src-supplier=Newark, ComponentLink7Description=http://www.farnell.com/datasheets/2079202.pdf?src-supplier=Element14, ComponentLink7URL=http://www.farnell.com/datasheets/2079202.pdf?src-supplier=Element14, ComponentLink8Description=LCSC, ComponentLink8URL=https://www.lcsc.com/product-detail/Multilayer-Ceramic-Capacitors-MLCC-SMD-SMT_Murata-Electronics-GRM32ER71J106KA12L_C437568.html, Item Type=Capacitor, Manufacturer Part Number=GRM32ER71J106KA12L, Pricing="1000=0.3451, 2000=0.33698, 4000=0.32886, 6000=0.32074, 8000=0.31262 (USD)", RoHS=Yes, Stock=55000, Supplier=Avnet, Supplier Part Number=GRM32ER71J106KA12L
C3 C5 C6 C12: library part GRM158R61A226ME15D, "CAP CER 22UF 10V X5R 0402", Case/Package=343Case, Dielectric=1537DielectricType, Max Operating Temperature=85°C, Min Operating Temperature=-55°C, Supplier Part Number=490-GRM158R61A226ME15DCT-ND, Tolerance=20%, Voltage Rating=10V, Category="Ceramic Capacitors", Height=800um, Item Type=Capacitor, Length=1mm, Material=4241ConductorMaterial, Pricing="1=0.45, 10=0.299, 50=0.2202, 100=0.1794, 500=0.1416, 1000=0.11957, 2500=0.11328 (USD)", RoHS=Yes, Stock=26634, Supplier=Digi-Key, Thickness=800um, Voltage Rating (DC)=10V, Width=500um
C7 C17 C23 C24 C26 C27 C29 C30: library part CL05A105KA5NQNC, "CAP CER 1UF 25V X5R 0402", Case Code (Imperial)=0402, Case Code (Metric)=1005, Dielectric=X5R, LCSC Part Number=C52923, Manufacturer=Samsung, Max Operating Temperature=85°C, Min Operating Temperature=-55°C, Package Quantity=10000, Tolerance=10%, Voltage Rating=25V, Case/Package=0402, Category="Ceramic Capacitors", ComponentLink1Description=https://datasheet.ciiva.com/25720/cl05a105ka5nqnc-25720771.pdf?src-supplier=Digi-Key, ComponentLink1URL=https://datasheet.ciiva.com/25720/cl05a105ka5nqnc-25720771.pdf?src-supplier=Digi-Key, ComponentLink2Description=https://datasheet.ciiva.com/3777/cl05a105ka5nqnc-3777709.pdf?src-supplier=Arrow+Electronics, ComponentLink2URL=https://datasheet.ciiva.com/3777/cl05a105ka5nqnc-3777709.pdf?src-supplier=Arrow+Electronics, ComponentLink3Description=https://datasheet.ciiva.com/29198/459147-da-01-en-vs-kondensator-0402-29198339.pdf?src-supplier=Conrad, ComponentLink3URL=https://datasheet.ciiva.com/29198/459147-da-01-en-vs-kondensator-0402-29198339.pdf?src-supplier=Conrad, Construction=Flat, Depth=0.5mm, Height=0.5mm, Item Type=Capacitor, Lead Free="Lead Free", Length=1mm, Manufacturer Part Number=CL05A105KA5NQNC, Material=Ceramic, Mounting Technology="Surface Mount", Packaging="Tape and Reel", Pricing 1="10000=0.0256, 20000=0.0238, 30000=0.0228, 50000=0.0207, 100000=0.0175, 250000=0.0157 (USD)", Radiation Hardening=No, RoHS=Yes, RoHS Compliant=Yes, Series=CL, Stock 1=80000, Supplier 1="Arrow Electronics", Supplier Part Number 1=CL05A105KA5NQNC, Thickness=0.022inch, Width=0.02inch
C8: library part CL10A475KA8NQNC, "CAP CER 4.7UF 25V X5R 0603", Capacitance=4.7uF, Case Code (Imperial)=0603, Case Code (Metric)=1608, Dielectric=X5R, LCSC Part Number=C69335, Manufacturer=Samsung, Max Operating Temperature=85°C, Min Operating Temperature=-55°C, Package Quantity=1, Supplier Part Number 1=1276-1900-1-ND, Tolerance=10%, Voltage Rating=25V, Case/Package=0603, ComponentLink1Description=http://www.samsungsem.com/kr/support/product-search/mlcc/CL10A475KA8NQNC.jsp?src-supplier=Digi-Key, ComponentLink1URL=http://www.samsungsem.com/kr/support/product-search/mlcc/CL10A475KA8NQNC.jsp?src-supplier=Digi-Key, Contact Plating=Tin, Depth=0.8mm, Lead Free="Lead Free", Length=1.6mm, Manufacturer Part Number=CL10A475KA8NQNC, Mount="Surface Mount", Packaging="Tape and Reel", Pricing 1="1=0.37, 10=0.255, 100=0.1528, 500=0.11456, 1000=0.09675 (USD)", Stock 1=2252340, Supplier 1=Digi-Key, Termination=Wraparound, Thickness=0.035inch, Width=0.031inch
C9: library part CC1206KKX7RCBB472, "CAP CER 4700PF 1KV X7R 1206", Case Code (Imperial)=1206, Case Code (Metric)=3216, Dielectric=X7R, Dielectric Material=Ceramic, LCSC Part Number=C107198, Manufacturer=Yageo, Max Operating Temperature=125°C, Min Operating Temperature=-55°C, Supplier Part Number 1=7130131, Tolerance=10%, Voltage Rating=1kV, Capacitance=4.7nF, Case/Package=1206, Category="Ceramic Capacitors", ComponentLink1Description=https://datasheet.ciiva.com/13208/upy-gp-np0-16v-to-50v-8-13208693.pdf?src-supplier=Mouser, ComponentLink1URL=https://datasheet.ciiva.com/13208/upy-gp-np0-16v-to-50v-8-13208693.pdf?src-supplier=Mouser, ComponentLink2Description=https://datasheet.ciiva.com/11466/hv-11466701.pdf?src-supplier=Avnet, ComponentLink2URL=https://datasheet.ciiva.com/11466/hv-11466701.pdf?src-supplier=Avnet, Depth=1.6mm, Item Type=Capacitor, Lead Free="Lead Free", Length=3.2mm, Manufacturer Part Number=CC1206KKX7RCBB472, Mount="Surface Mount", Number of Pins=2, Packaging="Tape and Reel", Pricing 1="3000=0.02860, 9000=0.02750, 15000=0.02700, 45000=0.02600, 75000=0.02510 (USD)", Radiation Hardening=No, Resistor Type=Ceramic, RoHS=Yes, RoHS Compliant=Yes, Series=CC, Stock 1=180000, Supplier 1="Future Electronics", Termination=SMD/SMT, Thickness=0.057inch, Voltage Rating (DC)=1kV, Weight=0.000571oz, Width=0.063inch
C18: library part CC0402MRX5R6BB106, "CAP CER 10UF 10V X5R 0402", Case Code (Imperial)=0402, Case Code (Metric)=1005, LCSC Part Number=C962143, Manufacturer=Yageo, Max Operating Temperature=85°C, Min Operating Temperature=-55°C, Supplier Part Number 1=6097631, Tolerance=20%, Voltage Rating=10V, Capacitance=10uF, Case/Package=0402, Category="Ceramic Capacitors", ComponentLink1Description=http://www.yageo.com/documents/recent/UPY-GPHC_X5R_4V-to-50V_25.pdf?src-supplier=Digi-Key, ComponentLink1URL=http://www.yageo.com/documents/recent/UPY-GPHC_X5R_4V-to-50V_25.pdf?src-supplier=Digi-Key, Item Type=Capacitor, Manufacturer Part Number=CC0402MRX5R6BB106, Mount="Surface Mount", Packaging="Tape and Reel", Pricing 1="10000=0.02650, 20000=0.02590, 30000=0.02550, 40000=0.02530, 50000=0.02450 (USD)", RoHS=Yes, RoHS Compliant=Yes, Stock 1=80000, Supplier 1="Future Electronics"
C19 C21: library part CGA3E2C0G2A680JT0Y0N, "CAP CER 68PF 100V C0G 0603", LCSC Part Number=C694224, Manufacturer=CGA3E2C0G2A680J080AA, Package=0603, Item Type=Capacitor, Manufacturer Part Number=CGA3E2C0G2A680JT0Y0N
C20: library part CC0603JRNPO9BN472, "CAP CER 4700PF 50V C0G/NPO 0603", LCSC Part Number=C576818, Manufacturer=Yageo, Supplier Part Number 1=13-CC0603JRNPO9BN472CT-ND, Category="Ceramic Capacitors", ComponentLink1Description=LCSC, ComponentLink1URL=https://www.lcsc.com/product-detail/Multilayer-Ceramic-Capacitors-MLCC-SMD-SMT_YAGEO-CC0603JRNPO9BN472_C576818.html, Item Type=Capacitor, Manufacturer Part Number=CC0603JRNPO9BN472, Pricing 1="1=0.48000, 10=0.33000, 50=0.23100, 100=0.19800, 500=0.14854, 1000=0.12543 (USD)", RoHS=Yes, RoHS Compliant=Yes, Stock 1=31779, Supplier 1=Digi-Key
D1 D3 D4: "DIODE SCHOTTKY 30V 1A SOD123W", LCSC Part Number=C456106, Manufacturer=Nexperia, Supplier Part Number 1=1727-5201-1-ND, Manufacturer Part Number=PMEG3010ER,115, Pricing 1="1=0.35, 10=0.282, 25=0.258, 100=0.162, 250=0.1602, 500=0.15, 1000=0.102 (USD)", Stock 1=72983, Supplier 1=Digi-Key
D2: "TVS DIODE 26VWM 42.1VC SMB", LCSC Part Number=C135062, Manufacturer=Diodes, Supplier Part Number=3363900, ComponentLink1Description=https://datasheet.ciiva.com/15143/getdatasheetpartid-118169-15143570.pdf?src-supplier=Verical, ComponentLink1URL=https://datasheet.ciiva.com/15143/getdatasheetpartid-118169-15143570.pdf?src-supplier=Verical, ComponentLink2Description=https://datasheet.ciiva.com/16211/ds19002-16211003.pdf?src-supplier=Future+Electronics, ComponentLink2URL=https://datasheet.ciiva.com/16211/ds19002-16211003.pdf?src-supplier=Future+Electronics, Item Type="TVS Diodes", Manufacturer Part Number=SMBJ26A-13-F, Pricing="3000=0.0717, 9000=0.069, 15000=0.0677, 30000=0.0661, 60000=0.0635 (USD)", RoHS=Yes, Stock=9000, Supplier="Future Electronics"
D5 D6 D7: "SOD-523 ESD Protection Devices ROHS", LCSC Part Number=C5199850, Manufacturer=UMW, Package=SOD-523, ComponentLink1Description=LCSC, ComponentLink1URL=https://www.lcsc.com/product-detail/span-style-background-color-ff0-ESD-span-Protection-Devices_UMW-Youtai-Semiconductor-Co-Ltd-LESD5D5-0CT1G_C5199850.html, Item Type="Protection Device", Manufacturer Part Number=LESD5D5.0CT1G
D8: "TVS DIODE 7V/12V 14V/26V SOT23-3", Breakdown Voltage=13.3V, Case/Package=SOT-23, Clamping Voltage=19V, LCSC Part Number=C404012, Leakage Current=20uA, Manufacturer=Bourns, Max Operating Temperature=150°C, Max Power Dissipation=600W, Max Surge Current=30A, Min Breakdown Voltage=7.5V, Min Operating Temperature=-55°C, Peak Pulse Current=17A, Peak Pulse Power=400W, Power Line Protection=No, Reverse Standoff Voltage=12V, Supplier Part Number=7673728P, Test Current=1mA, Category="TVS Diodes", ComponentLink1Description=https://datasheet.ciiva.com/1281/1670933-1281331.pdf?src-supplier=Farnell, ComponentLink1URL=https://datasheet.ciiva.com/1281/1670933-1281331.pdf?src-supplier=Farnell, ComponentLink2Description=https://datasheet.ciiva.com/4510/cdsot23-sm712-25932-4510261.pdf?src-supplier=Mouser, ComponentLink2URL=https://datasheet.ciiva.com/4510/cdsot23-sm712-25932-4510261.pdf?src-supplier=Mouser, ComponentLink3Description=https://datasheet.ciiva.com/11193/cdsot23-sm712-11193846.pdf?src-supplier=Avnet, ComponentLink3URL=https://datasheet.ciiva.com/11193/cdsot23-sm712-11193846.pdf?src-supplier=Avnet, ComponentLink4Description=https://datasheet.ciiva.com/22696/1670933-22696779.pdf?src-supplier=Element14, ComponentLink4URL=https://datasheet.ciiva.com/22696/1670933-22696779.pdf?src-supplier=Element14, ComponentLink5Description=https://datasheet.ciiva.com/26828/getdatasheetpartid-418501-26828522.pdf?src-supplier=Verical, ComponentLink5URL=https://datasheet.ciiva.com/26828/getdatasheetpartid-418501-26828522.pdf?src-supplier=Verical, ComponentLink6Description=https://datasheet.ciiva.com/337/cdsot23-sm712-337451.pdf?src-supplier=Digikey, ComponentLink6URL=https://datasheet.ciiva.com/337/cdsot23-sm712-337451.pdf?src-supplier=Digikey, ComponentLink7Description=https://datasheet.ciiva.com/337/cdsot23-sm712-337452.pdf?src-supplier=Digikey, ComponentLink7URL=https://datasheet.ciiva.com/337/cdsot23-sm712-337452.pdf?src-supplier=Digikey, Contact Plating=Tin, Depth=1.4mm, Diode Type=ZENER, Direction=Bidirectional, ESD Protection=Yes, Height=1.11mm, Item Type="Surge Protection (TVS/ESD)", Length=3.04mm, Manufacturer Part Number=CDSOT23-SM712, Max Breakdown Voltage=13.3V, Max Reverse Leakage Current=20uA, Mounting Technology="Surface Mount", Number of Bidirectional Channels=2, Number of Channels=2, Number of Elements=2, Packaging="Tape and Reel", Pins=3, Polarity=Bidirectional,Unidirectional, Power Dissipation=400W, Pricing="100=0.935, 1500=0.651, 3000=0.565, 6000=0.553 (GBP)", Radiation Hardening=No, Reach SVHC Compliant=No, Reverse Breakdown Voltage=13.3V, RoHS=Yes, RoHS Compliant=Yes, Series=-, Stock=89660, Supplier=Rs, Termination=SMD/SMT, Width=0.055inch, Working Voltage=12V
D9 D10 D11 D12 D13 D14 D15 D16 D17 D18: "TVS DIODE 12VWM 38VC DFN1006-2", Breakdown Voltage=14.6V, Case/Package=111Case, Clamping Voltage=38V, LCSC Part Number=C111472, Leakage Current=10nA, Manufacturer=Nexperia, Max Operating Temperature=150°C, Max Power Dissipation=290W, Min Operating Temperature=-55°C, Peak Pulse Current=7.8A, Power Line Protection=5898YesNo, Reverse Standoff Voltage=12V, ComponentLink1Description=http://www.farnell.com/datasheets/2178732.pdf?src-supplier=Farnell, ComponentLink1URL=http://www.farnell.com/datasheets/2178732.pdf?src-supplier=Farnell, ComponentLink2Description=https://assets.nexperia.com/documents/data-sheet/PESD12VV1BL.pdf?src-supplier=Digikey, ComponentLink2URL=https://assets.nexperia.com/documents/data-sheet/PESD12VV1BL.pdf?src-supplier=Digikey, Depth=620um, Direction=211Direction, Element Configuration=5460ElementConfiguration, Item Type=Diode, Length=1.02mm, Manufacturer Part Number=PESD12VV1BL,315, Min Breakdown Voltage=14.6V, Mounting Technology=8Mount, Number of Bidirectional Channels=1NUMBER, Number of Channels=1NUMBER, Peak Pulse Power=290W, Pins=2NUMBER, Polarity=211Direction, Pricing="10000=0.029, 30000=0.028, 40000=0.0277, 100000=0.0269, 150000=0.0261 (USD)", Radiation Hardening=5898YesNo, RoHS=Yes, Stock=70000, Supplier="Future Electronics", Termination=4890ConnectorType, Working Voltage=12V
D19 D20 D21 D22 D23 D24 D25 D26: "Independent Type 4.84V~5.36V 1W 5.1V SMA Zener Diodes ROHS", LCSC Part Number=C382953, Manufacturer="Shandong Jingdao Microelectronics", Package=SMA, ComponentLink1Description=LCSC, ComponentLink1URL=https://www.lcsc.com/product-detail/Zener-Diodes_Shandong-Jingdao-Microelectronics-1SMA4733A_C382953.html, Item Type=Diode, Manufacturer Part Number=1SMA4733A
D27 D28: "DIODE ZENER 5.1V 500MW SOD123", LCSC Part Number=C85181, Manufacturer=Diodes, Supplier Part Number=5522370, Category="Zener Diodes", ComponentLink1Description=https://datasheet.ciiva.com/34302/1541116-34302407.pdf?src-supplier=Jameco, ComponentLink1URL=https://datasheet.ciiva.com/34302/1541116-34302407.pdf?src-supplier=Jameco, ComponentLink2Description=https://datasheet.ciiva.com/26912/getdatasheetpartid-141394-26912348.pdf?src-supplier=Verical, ComponentLink2URL=https://datasheet.ciiva.com/26912/getdatasheetpartid-141394-26912348.pdf?src-supplier=Verical, ComponentLink3Description=https://datasheet.ciiva.com/4734/ds18010-38133-4734216.pdf?src-supplier=Mouser, ComponentLink3URL=https://datasheet.ciiva.com/4734/ds18010-38133-4734216.pdf?src-supplier=Mouser, Item Type="Zener Diode", Manufacturer Part Number=MMSZ5231B-7-F, Pricing="3000=0.0138, 12000=0.0132, 45000=0.0127, 90000=0.0124, 225000=0.0118 (USD)", RoHS=Yes, Stock=273000, Supplier="Future Electronics"
D29: "DIODE SCHOTTKY 20V 1A SOD123FL", Average Rectified Current=1A, Forward Voltage=340mV, LCSC Part Number=C295749, Manufacturer="ON Semiconductor", Max Forward Surge Current (Ifsm)=45A, Max Operating Temperature=125°C, Max Repetitive Reverse Voltage (Vrrm)=20V, Max Reverse Leakage Current=600uA, Min Operating Temperature=-65°C, Package Quantity=10000, Supplier Part Number 1=MBR120VLSFT3GOSCT-ND, ComponentLink1Description=http://www.mouser.com/ds/2/308/MBR120VLSFT1-D-107081.pdf?src-supplier=Mouser, ComponentLink1URL=http://www.mouser.com/ds/2/308/MBR120VLSFT1-D-107081.pdf?src-supplier=Mouser, ComponentLink2Description=http://www.onsemi.com/pub/Collateral/MBR120VLSFT1-D.PDF?src-supplier=Digi-Key, ComponentLink2URL=http://www.onsemi.com/pub/Collateral/MBR120VLSFT1-D.PDF?src-supplier=Digi-Key, ComponentLink3Description=http://www.onsemi.cn/pub_link/Collateral/MBR120VLSFT1-D.PDF?src-supplier=Avnet, ComponentLink3URL=http://www.onsemi.cn/pub_link/Collateral/MBR120VLSFT1-D.PDF?src-supplier=Avnet, Current Rating=1A, Element Configuration=Single, Forward Current=1A, Halogen Free="Halogen Free", Lead Free="Lead Free", Manufacturer Part Number=MBR120VLSFT3G, Max Reverse Voltage (DC)=20V, Max Surge Current=45A, Number of Pins=2, Output Current=1A, Packaging="Tape and Reel", Peak Non-Repetitive Surge Current=45A, Peak Reverse Current=600uA, Polarity=Standard, Pricing 1="1=0.42, 10=0.338, 100=0.2298, 500=0.17234, 1000=0.12926 (USD)", Radiation Hardening=No, REACH SVHC="No SVHC", Stock 1=130499, Supplier 1=Digi-Key, Voltage Rating (DC)=20V
F1: "48V 750mA 1.5A 1812 Resettable Fuses ROHS", LCSC Part Number=C19193053, Manufacturer=LUTE, Package=1812, ComponentLink1Description=LCSC, ComponentLink1URL=https://www.lcsc.com/product-detail/Resettable-Fuses_LUTE-1812L075-48GR_C19193053.html, Item Type=Fuses, Manufacturer Part Number=1812L075/48GR
FB1 FB2 FB3: "FERRITE BEAD 1K OHM 0805 1LN", Case Code (Imperial)=0805, Case Code (Metric)=2012, DC Resistance (DCR)=300mR, LCSC Part Number=C307765, Manufacturer=TDK, Max Current Rating=500mA, Max Operating Temperature=125°C, Min Operating Temperature=-55°C, Package Quantity=4000, Ratings=AEC-Q200, Supplier Part Number 1=445-MMZ2012R102ATD25CT-ND, Test Frequency=100MHz, Tolerance=25%, Case/Package=0805, Category="Ferrite Beads and Chips", ComponentLink1Description=http://www.mouser.com/ds/2/400/beads_automotive_signal_mmz_en-469244.pdf?src-supplier=Mouser, ComponentLink1URL=http://www.mouser.com/ds/2/400/beads_automotive_signal_mmz_en-469244.pdf?src-supplier=Mouser, ComponentLink2Description=https://product.tdk.com/info/en/catalog/datasheets/beads_automotive_signal_mmz2012_en.pdf?src-supplier=Digi-Key, ComponentLink2URL=https://product.tdk.com/info/en/catalog/datasheets/beads_automotive_signal_mmz2012_en.pdf?src-supplier=Digi-Key, Height=0.041inch, Impedance=1kR, Item Type="Ferrite Bead", Length=0.079inch, Manufacturer Part Number=MMZ2012R102ATD25, Max DC Current=500mA, Mount="Surface Mount", Number of Lines=1, Packaging="Tape and Reel", Pricing 1="1=0.11000, 10=0.09200, 25=0.08280, 50=0.06080, 100=0.05240, 250=0.04140, 500=0.03496, 1000=0.02944 (USD)", RoHS=Yes, RoHS Compliant=Yes, Stock 1=2942, Supplier 1=Digi-Key, Termination=SMD/SMT, Weight=0.000194oz, Width=0.049inch
J1: "1 Brick nogging 14P Female Type-C SMD USB Connectors ROHS", Manufacturer="Korean Hroparts Elec", Package=SMD, ComponentLink1Description=LCSC, ComponentLink1URL=https://www.lcsc.com/product-detail/USB-Connectors_Korean-Hroparts-Elec-TYPE-C-31-D-07_C2689965.html, Item Type="USB Connector", Manufacturer Part Number=TYPE-C-31-D-07
J2: library part C145963, "1x6P SH 1 1mm 6 SMD,P=1mm Wire To Board / Wire To Wire Connector ROHS", Manufacturer=BOOMELE, Package=SMD,P=1mm, ComponentLink1Description=LCSC, ComponentLink1URL=https://www.lcsc.com/product-detail/Wire-To-Board-Wire-To-Wire-Connector_BOOMELE-Boom-Precision-Elec-C145963_C145963.html, Item Type=Connector, LCSC Part Number=C145963, Manufacturer Part Number=C145963
J3: "M12 RA M PNL REAR A 5P PCB SHLD", Manufacturer="TE Connectivity AMP Connectors", Package=Custom, Item Type=Connector, Manufacturer Part Number=T4144035051-000
J4: "1x4P 18A -40℃~+105℃ 250V Green 12~30 Direct Insert 5.08mm 2.5 1 4 Plugin,P=5.08mm Screw Terminal Blocks ROHS", LCSC Part Number=C2827883, Manufacturer=DORABO, Package=Plugin,P=5.08mm, ComponentLink1Description=LCSC, ComponentLink1URL=https://www.lcsc.com/product-detail/Screw-Terminal-Blocks_DORABO-DB128L-5-08-4P-GN-S_C2827883.html, Item Type="Terminal Block", Manufacturer Part Number=DB128L-5.08-4P-GN-S
J6 J7: "Right-Angle 2.5mm 6mm 10P 2.54mm 双排 2x5P Plugin,P=2.54mm Pin Headers ROHS", LCSC Part Number=C5383090, Manufacturer=HanElectricity, Package=Plugin,P=2.54mm, ComponentLink1Description=LCSC, ComponentLink1URL=https://www.lcsc.com/product-detail/Pin-Headers_HanElectricity-2541WR-2x05P_C5383090.html, Item Type="Pin Header", Manufacturer Part Number=2541WR-2x05P
L1: library part SWPA4030S4R7MT, "Fixed Ind 4.720%UH 0.06 Ohm 3200M", LCSC Part Number=C57269, Manufacturer=Sunlord, Supplier Part Number 1=3442-SWPA4030S4R7MTCT-ND, Category="Fixed Inductors", Manufacturer Part Number=SWPA4030S4R7MT, Pricing 1="1=0.44000, 10=0.38900, 25=0.36120, 50=0.30560, 100=0.27780, 250=0.26108, 500=0.23332, 1000=0.18887 (USD)", RoHS=Yes, RoHS Compliant=Yes, Stock 1=3730, Supplier 1=Digi-Key
L2: "CMC 51UH 200MA 2LN 2.8KOHM SMD", Case Code (Imperial)=1812, Current Rating=200mA, DC Resistance (DCR)=1R, Insulation Resistance=10MR, LCSC Part Number=C76584, Manufacturer=TDK, Max Operating Temperature=150°C, Min Operating Temperature=-40°C, Package Quantity=2000, Ratings=AEC-Q200, Test Frequency=10MHz, Tolerance=50%, Voltage Rating=50V, Case/Package=1812, Category="Fixed Inductors", ComponentLink1Description=https://datasheet.ciiva.com/22726/1649098-22726290.pdf?src-supplier=Element14, ComponentLink1URL=https://datasheet.ciiva.com/22726/1649098-22726290.pdf?src-supplier=Element14, ComponentLink2Description=https://datasheet.ciiva.com/1007/e9711-act-1007931.pdf?src-supplier=Digikey, ComponentLink2URL=https://datasheet.ciiva.com/1007/e9711-act-1007931.pdf?src-supplier=Digikey, ComponentLink3Description=https://datasheet.ciiva.com/1007/e9711-act-1007933.pdf?src-supplier=Digikey, ComponentLink3URL=https://datasheet.ciiva.com/1007/e9711-act-1007933.pdf?src-supplier=Digikey, ComponentLink4Description=https://datasheet.ciiva.com/8498/e9711-act-8498633.pdf?src-supplier=Avnet, ComponentLink4URL=https://datasheet.ciiva.com/8498/e9711-act-8498633.pdf?src-supplier=Avnet, ComponentLink5Description=https://datasheet.ciiva.com/7649/1833202-7649183.pdf?src-supplier=Element14, ComponentLink5URL=https://datasheet.ciiva.com/7649/1833202-7649183.pdf?src-supplier=Element14, ComponentLink6Description=https://datasheet.ciiva.com/1007/e9711-act-1007932.pdf?src-supplier=Digikey, ComponentLink6URL=https://datasheet.ciiva.com/1007/e9711-act-1007932.pdf?src-supplier=Digikey, ComponentLink7Description=https://datasheet.ciiva.com/15191/getdatasheetpartid-349822-15191803.pdf?src-supplier=Verical, ComponentLink7URL=https://datasheet.ciiva.com/15191/getdatasheetpartid-349822-15191803.pdf?src-supplier=Verical, DC Current=200mA, DC Resistance-Max=1R, Depth=3.4mm, Height=3mm, Impedance=2.8kR, Item Type="Common Mode Filter", Lead Free=5697LeadFree, Length=4.5mm, Manufacturer Part Number=ACT45B-510-2P-TL003, Max Current Rating=200mA, Max DC Current=200mA, Military Standard=Not, Mounting Technology="Surface Mount", Number of Lines=2, Packaging="Tape and Reel", Pins=4, Pricing="2500=0.8915, 5000=0.8612, 10000=0.8526 (USD)", Radiation Hardening=No, Reach SVHC Compliant=No, RoHS=Yes, RoHS Compliant=Yes, Series=ACT, Stock=390000, Supplier="Arrow Electronics", Supplier Part Number=ACT45B-510-2P-TL003, Termination=SMD/SMT, Voltage Rating (DC)=50V, Width=3.2mm
LED1 LED5: library part NCD0603R3, "RED LED 0603 Light Emitting Diodes", LCSC Part Number=C3151730, Manufacturer="Foshan NationStar Optoelectronics", Package=0603, ComponentLink1Description=LCSC, ComponentLink1URL=https://www.lcsc.com/product-detail/Light-Emitting-Diodes-LED_Foshan-NationStar-Optoelectronics-NCD0603R3_C3151730.html, Item Type=LED, Manufacturer Part Number=NCD0603R3
LED2 LED3: library part NCD0603Y2, "yellow 0603 Light Emitting Diodes (LED) ROHS", LCSC Part Number=C89811, Manufacturer="Foshan NationStar Optoelectronics", Package=0603, ComponentLink1Description=LCSC, ComponentLink1URL=https://www.lcsc.com/product-detail/Light-Emitting-Diodes-LED_Foshan-NationStar-Optoelectronics-NCD0603Y2_C89811.html, Item Type=LED, Manufacturer Part Number=NCD0603Y2
LED4: library part NCD0603G2, "Emerald 0603 Light Emitting Diodes (LED) ROHS", LCSC Part Number=C87326, Manufacturer="Foshan NationStar Optoelectronics", Package=0603, ComponentLink1Description=LCSC, ComponentLink1URL=https://www.lcsc.com/product-detail/Light-Emitting-Diodes-LED_Foshan-NationStar-Optoelectronics-NCD0603G2_C87326.html, Item Type=LED, Manufacturer Part Number=NCD0603G2
LED6: library part NCD0603B3, "blue 0603 Light Emitting Diodes (LED) ROHS", LCSC Part Number=C158101, Manufacturer="Foshan NationStar Optoelectronics", Package=0603, ComponentLink1Description=LCSC, ComponentLink1URL=https://www.lcsc.com/product-detail/Light-Emitting-Diodes-LED_Foshan-NationStar-Optoelectronics-NCD0603B3_C158101.html, Item Type=LED, Manufacturer Part Number=NCD0603B3
Q1 Q2: "25V 300mW 120@100mA,1V 1.5A NPN SOT-23 Bipolar Transistors - BJT ROHS", LCSC Part Number=C164886, Manufacturer="Jiangsu Changjing Electronics Technology", Package=SOT-23, ComponentLink1Description=LCSC, ComponentLink1URL=https://www.lcsc.com/product-detail/Bipolar-Transistors-BJT_Jiangsu-Changjing-Electronics-Technology-Co-Ltd-SS8050-G_C164886.html, Itype Type=Transistor, Manufacturer Part Number=SS8050-G
R1: library part RC0402FR-07240RL, "RES 240 OHM 1% 1/16W 0402", Case Code (Imperial)=0402, Case Code (Metric)=1005, Manufacturer=Yageo, Max Operating Temperature=155°C, Max Power Dissipation=63mW, Min Operating Temperature=-55°C, Package Quantity=1, Resistance Tolerance=1%, Resistor Type="Thick Film", Supplier Part Number 1=603-RC0402FR-07240RL, Temperature Coefficient=100ppm/°C, Voltage Rating=50V, Case/Package=0402, Category="Chip SMD Resistors", ComponentLink1Description=https://datasheet.ciiva.com/7849/1018594-7849915.pdf?src-supplier=Element14, ComponentLink1URL=https://datasheet.ciiva.com/7849/1018594-7849915.pdf?src-supplier=Element14, ComponentLink2Description=https://datasheet.ciiva.com/7849/1018594-7849916.pdf?src-supplier=Element14, ComponentLink2URL=https://datasheet.ciiva.com/7849/1018594-7849916.pdf?src-supplier=Element14, ComponentLink3Description=https://datasheet.ciiva.com/2519/pyu-r-int-thick-7-2519157.pdf?src-supplier=Digi-Key, ComponentLink3URL=https://datasheet.ciiva.com/2519/pyu-r-int-thick-7-2519157.pdf?src-supplier=Digi-Key, ComponentLink4Description=https://datasheet.ciiva.com/2519/pyu-r-int-thick-7-2519158.pdf?src-supplier=Digi-Key, ComponentLink4URL=https://datasheet.ciiva.com/2519/pyu-r-int-thick-7-2519158.pdf?src-supplier=Digi-Key, ComponentLink5Description=https://datasheet.ciiva.com/2519/pyu-r-int-thick-7-2519156.pdf?src-supplier=Digi-Key, ComponentLink5URL=https://datasheet.ciiva.com/2519/pyu-r-int-thick-7-2519156.pdf?src-supplier=Digi-Key, ComponentLink6Description=https://datasheet.ciiva.com/12669/pyu-rc0402-51-rohs-l-6-r-12669689.pdf?src-supplier=Mouser, ComponentLink6URL=https://datasheet.ciiva.com/12669/pyu-rc0402-51-rohs-l-6-r-12669689.pdf?src-supplier=Mouser, ComponentLink7Description=https://datasheet.ciiva.com/17419/pyu-rc0402-51-rohs-l-6-r-17419482.pdf?src-supplier=Future+Electronics, ComponentLink7URL=https://datasheet.ciiva.com/17419/pyu-rc0402-51-rohs-l-6-r-17419482.pdf?src-supplier=Future+Electronics, Construction=Rectangular, Depth=0.5mm, Features="Moisture Resistant", Height=0.016inch, Lead Free="Lead Free", Length=1mm, Manufacturer Part Number=RC0402FR-07240RL, Military Standard=Not, Number of Terminations=2, Packaging="Tape and Reel", Power Rating=63mW, Pricing 1="1=0.10000, 10=0.01200, 50=0.01200, 100=0.00500, 1000=0.00300, 10000=0.00100 (USD)", REACH SVHC=Unknown, Resistance=240R, RoHS=Yes, RoHS Compliant=Yes, Series=RC, Size Code=0402, Stock 1=1903202, Supplier 1=Mouser, Termination=SMD/SMT, Tolerance=1%, Voltage Rating (DC)=50V, Width=0.02inch